# Altium PCB actuator-driver.PcbDoc
Units mm, origin at the board's own origin, x right, y up, seen from the top; angles counter-clockwise.
Board outline 50 x 50 mm, 4 copper layers (Top Layer, L2_GND, L3_SIG_PWR, Bottom Layer), stack 1.571 mm thick; 69 components, 55 nets, 249 pads, 137 vias.
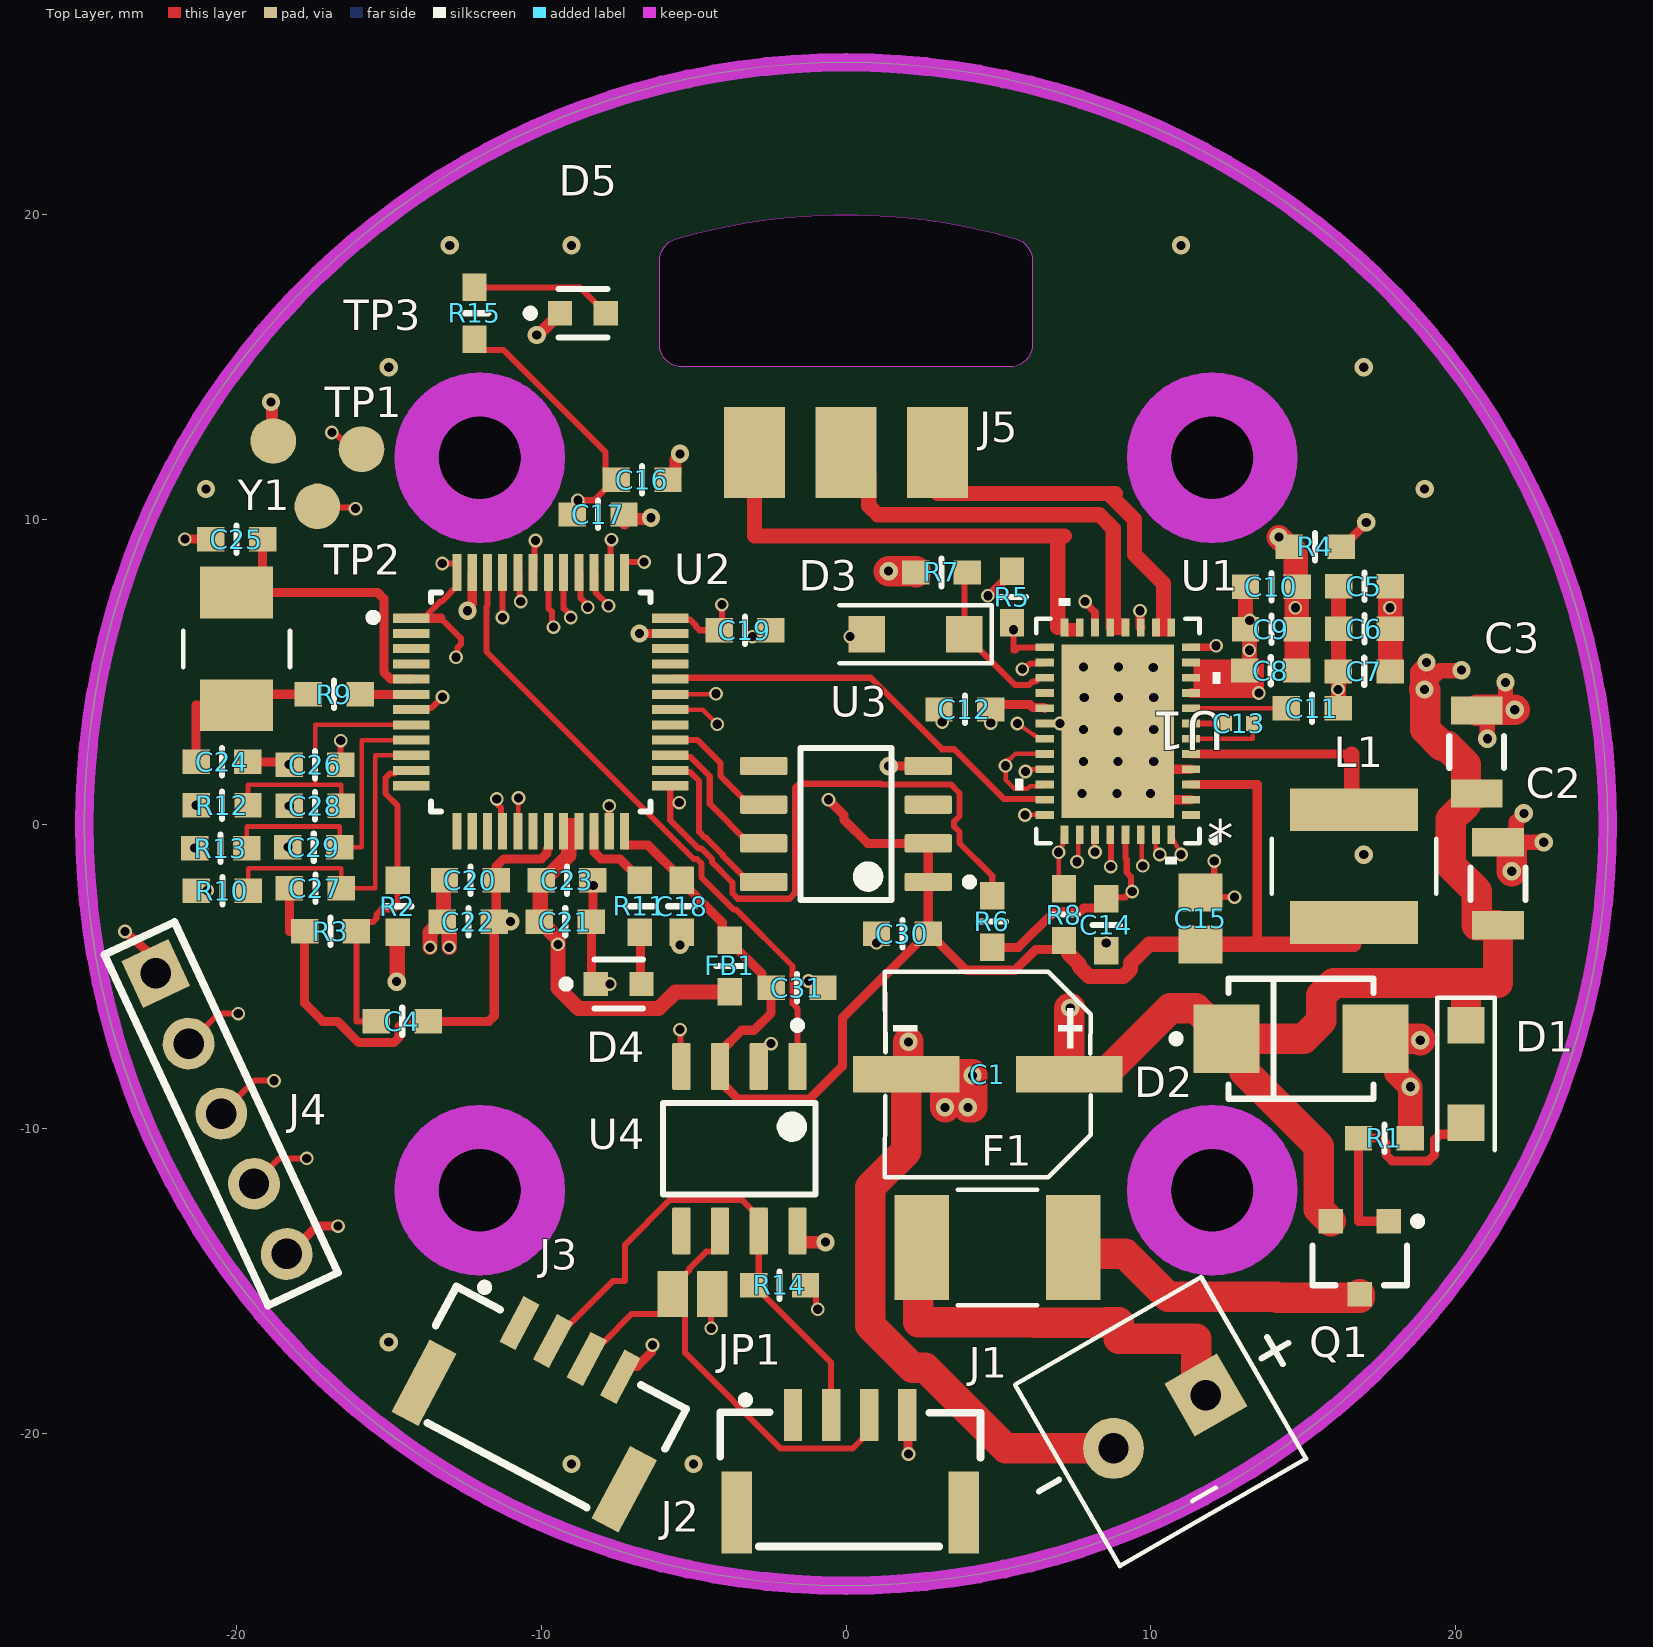
[diagram p0: Top Layer view]
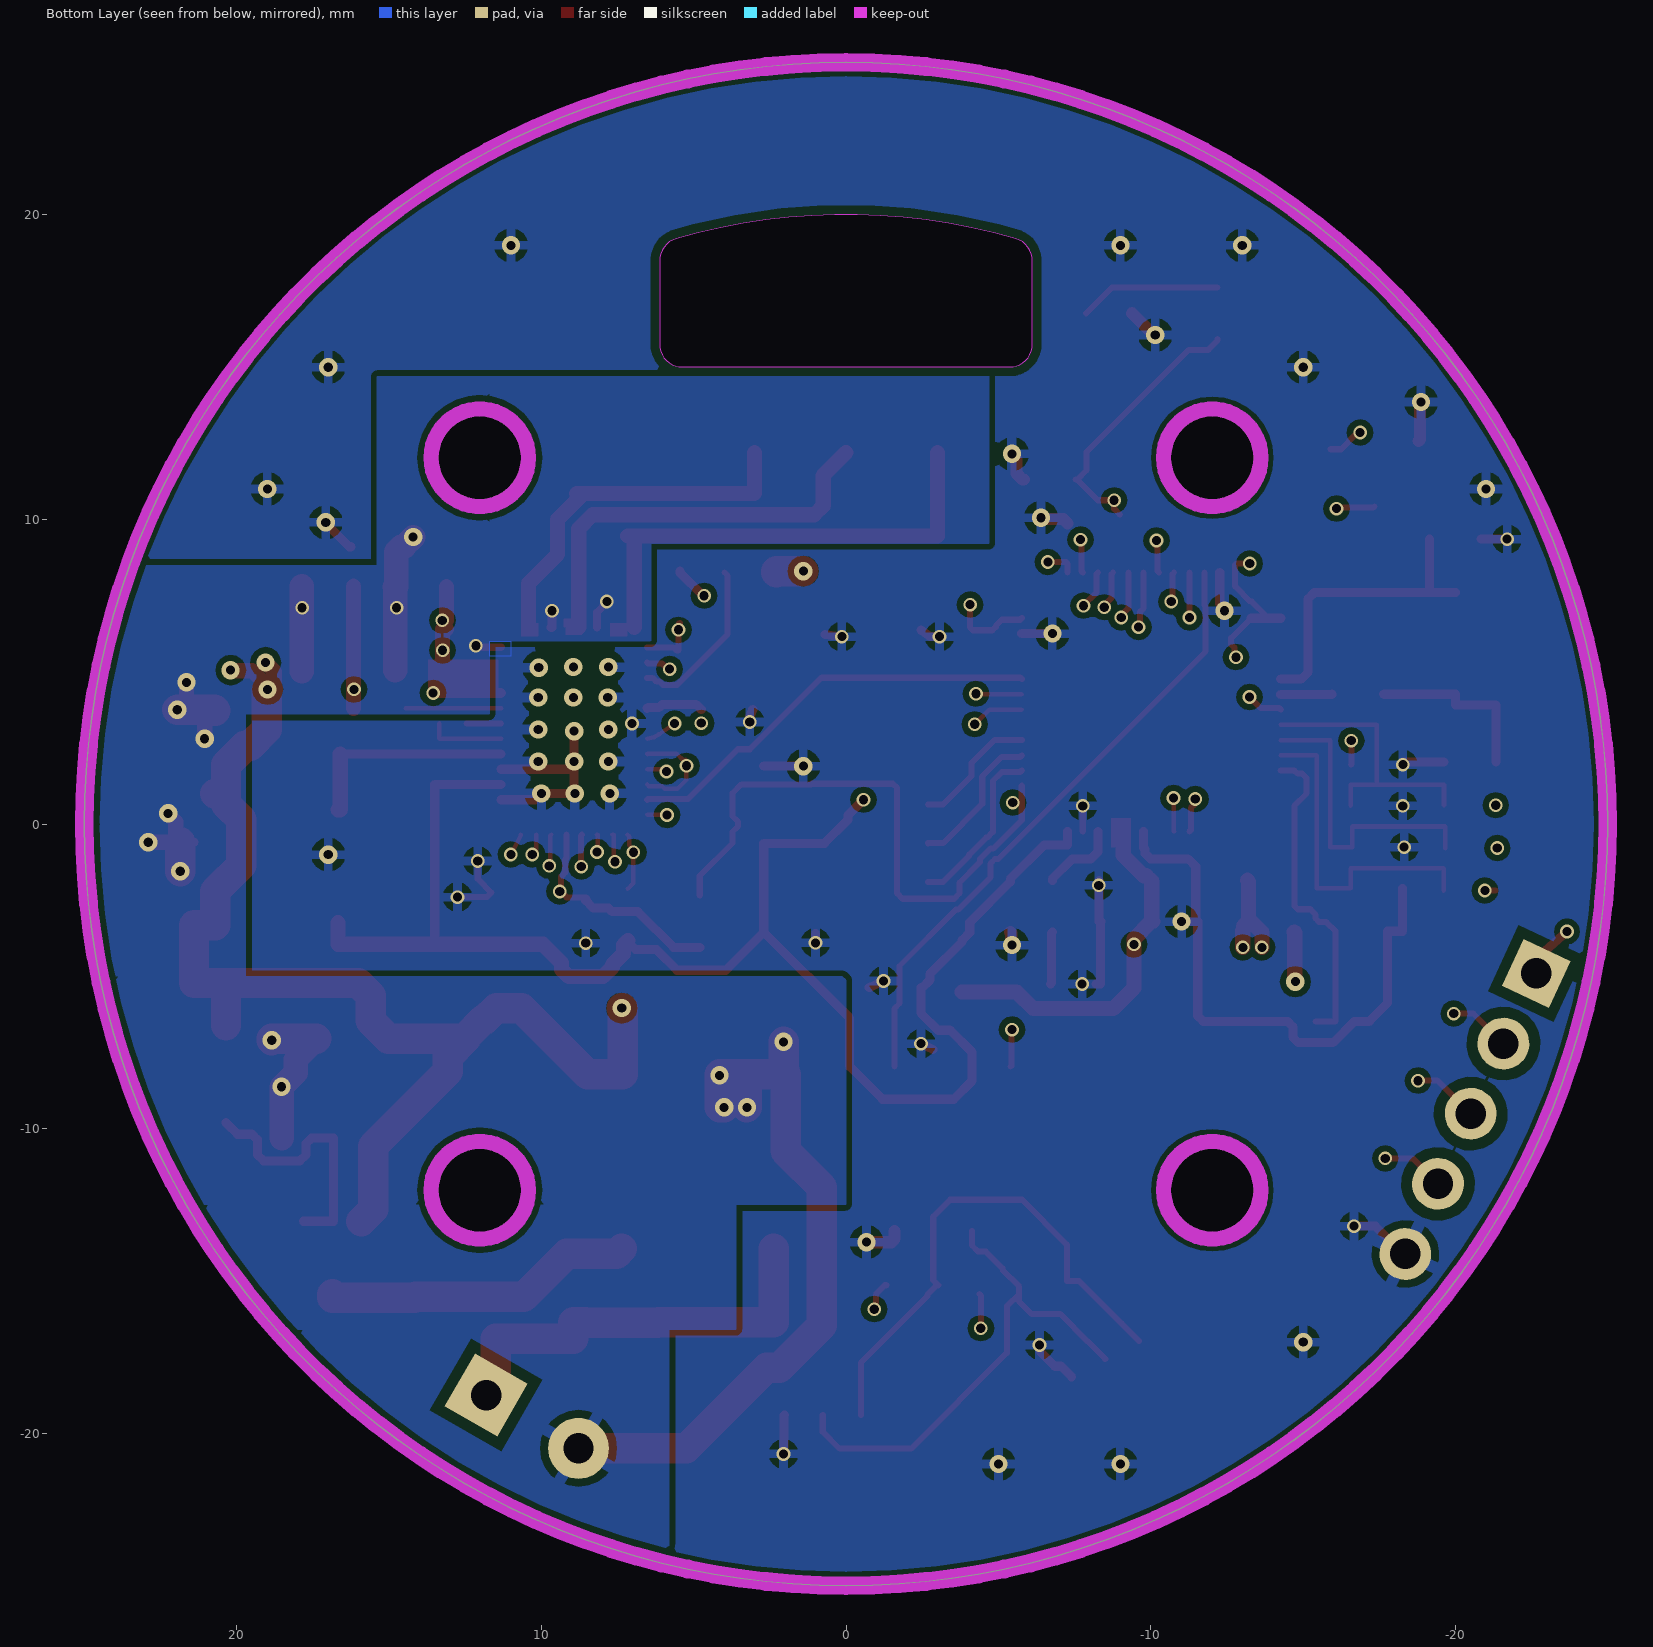
[diagram p1: Bottom Layer view, seen from below]
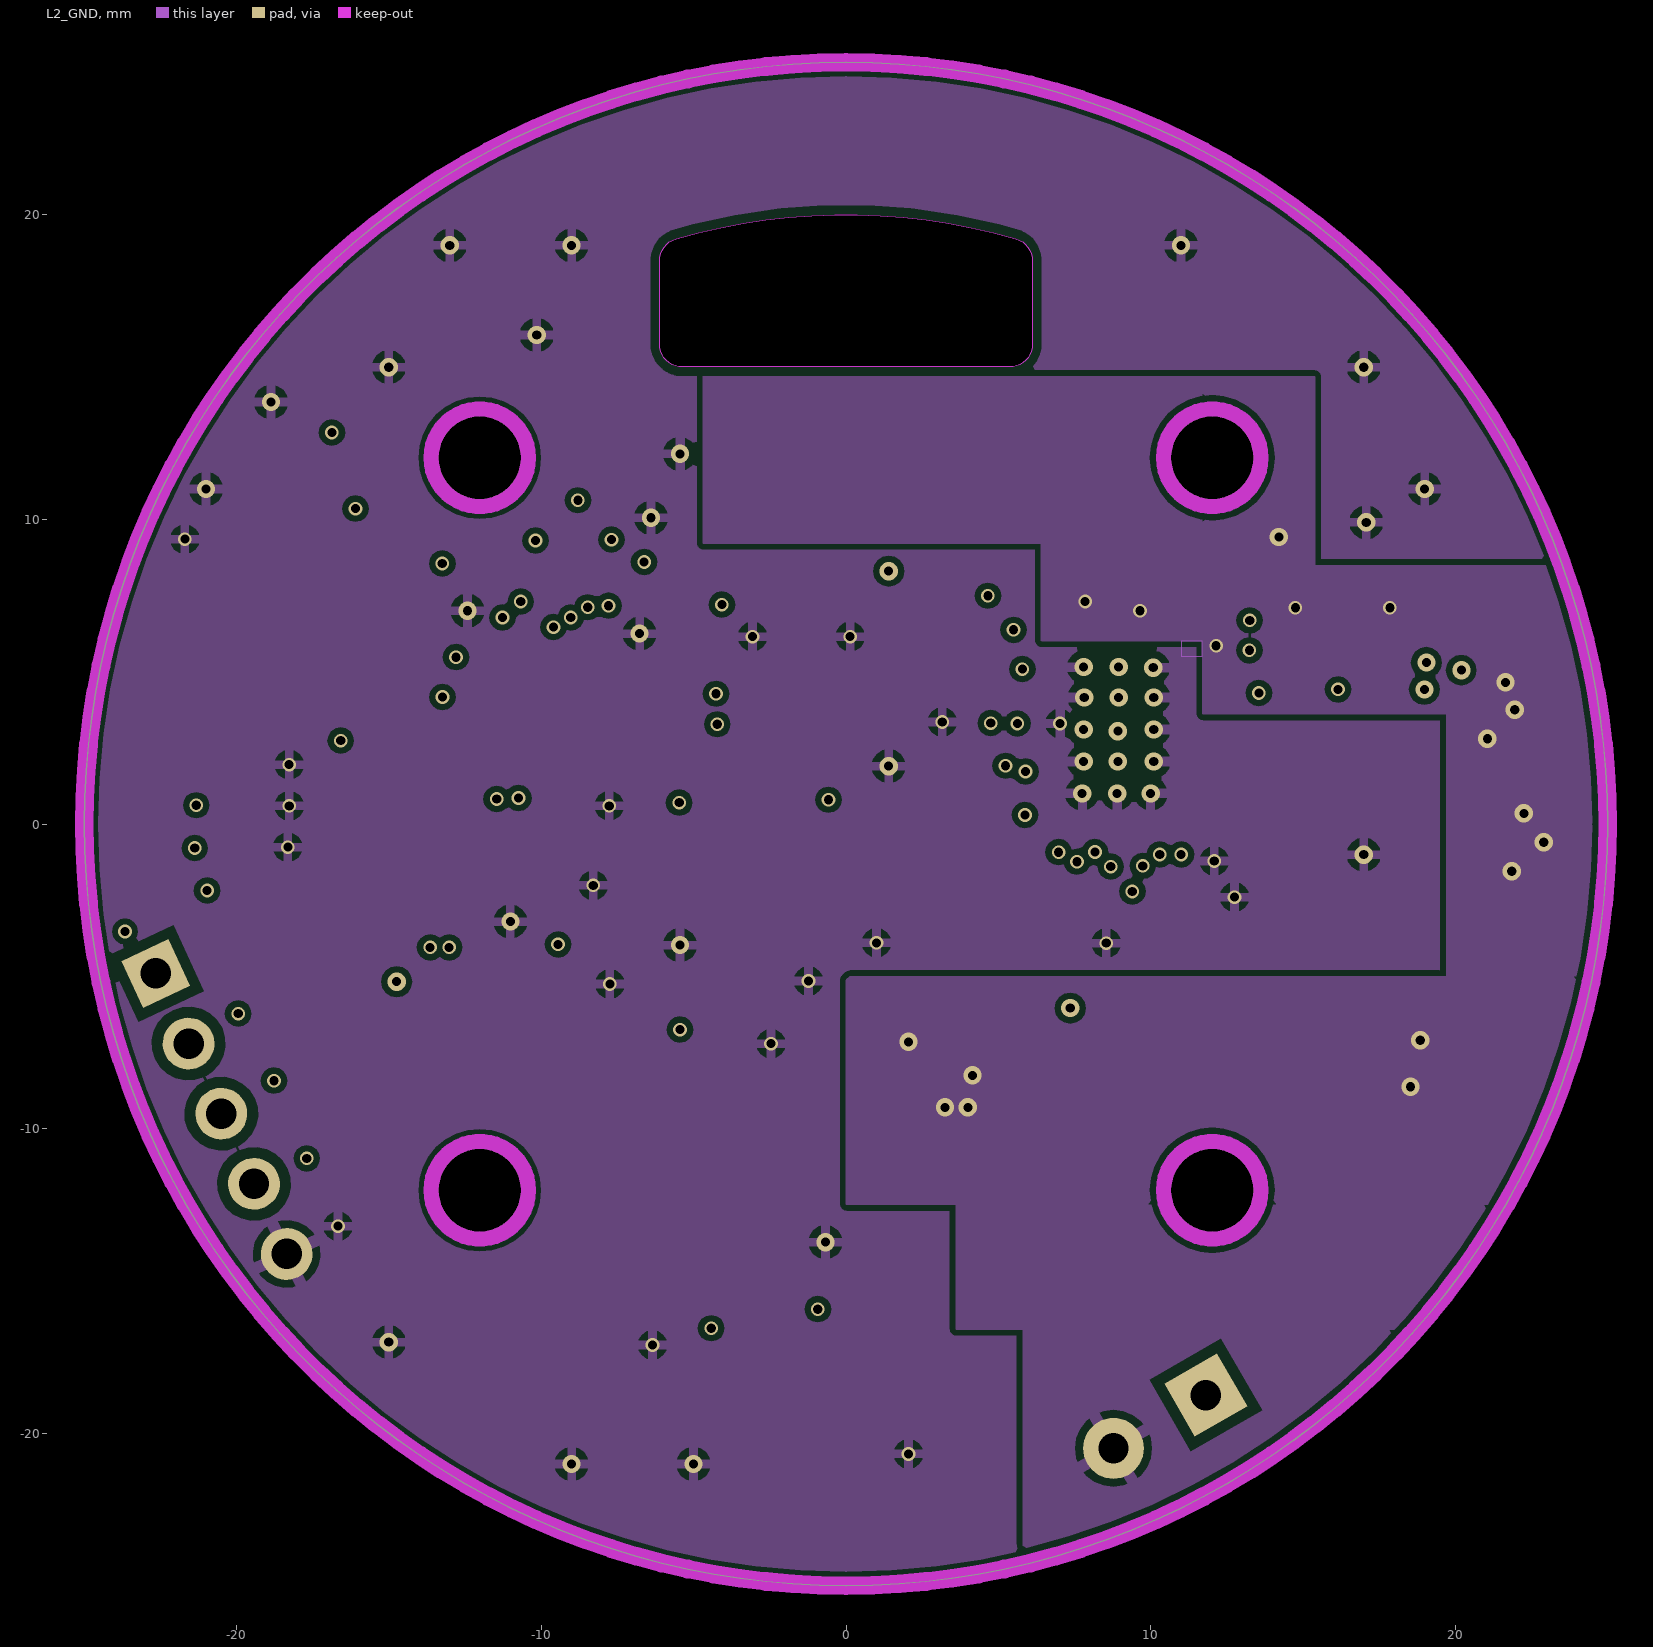
[diagram p2: L2_GND]
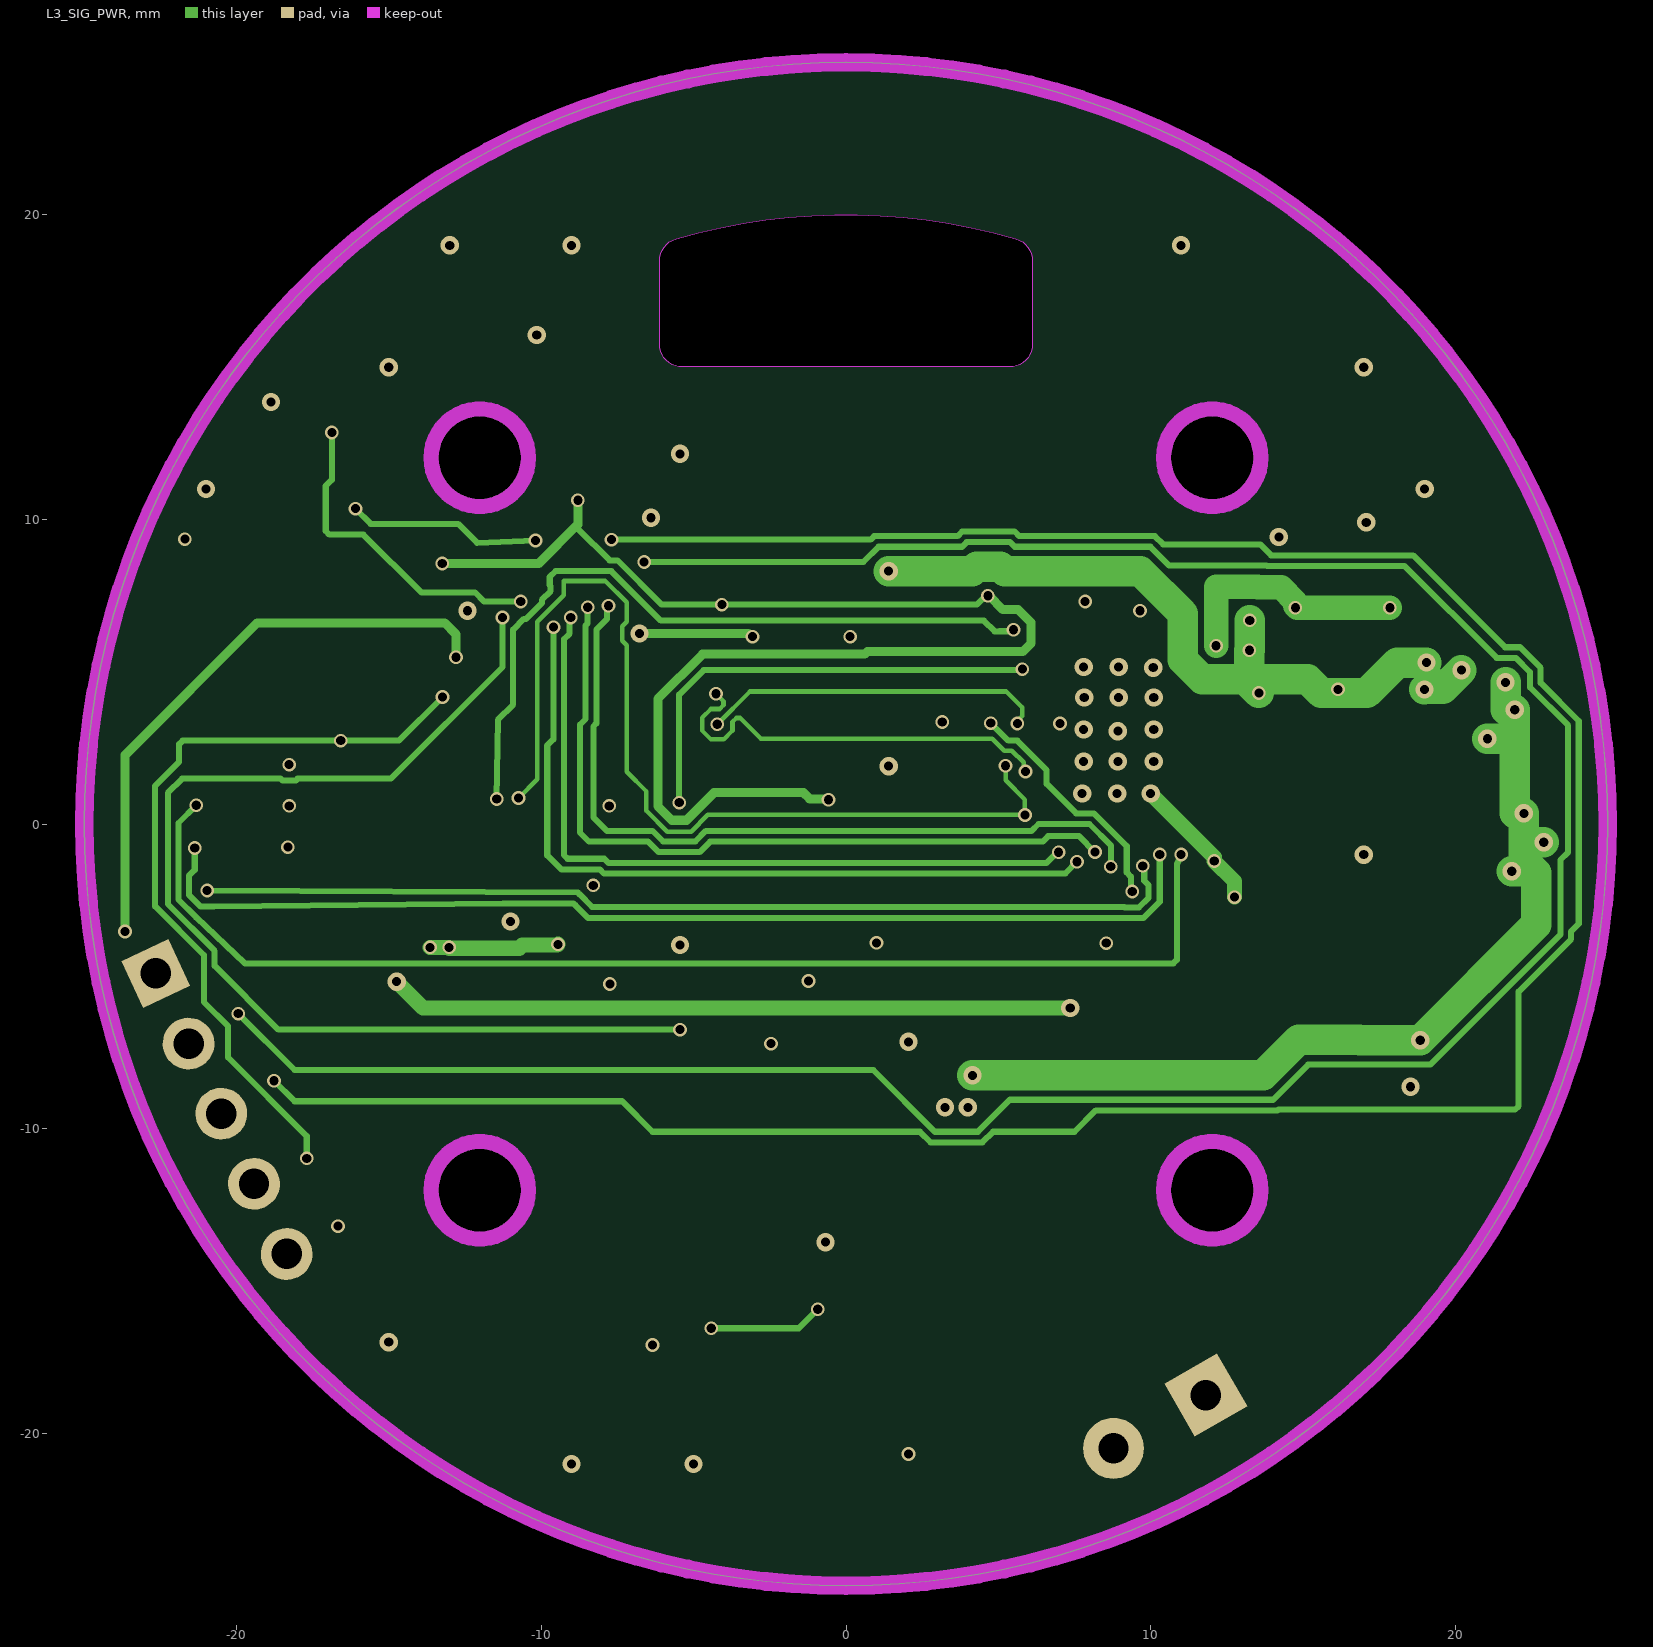
[diagram p3: L3_SIG_PWR]
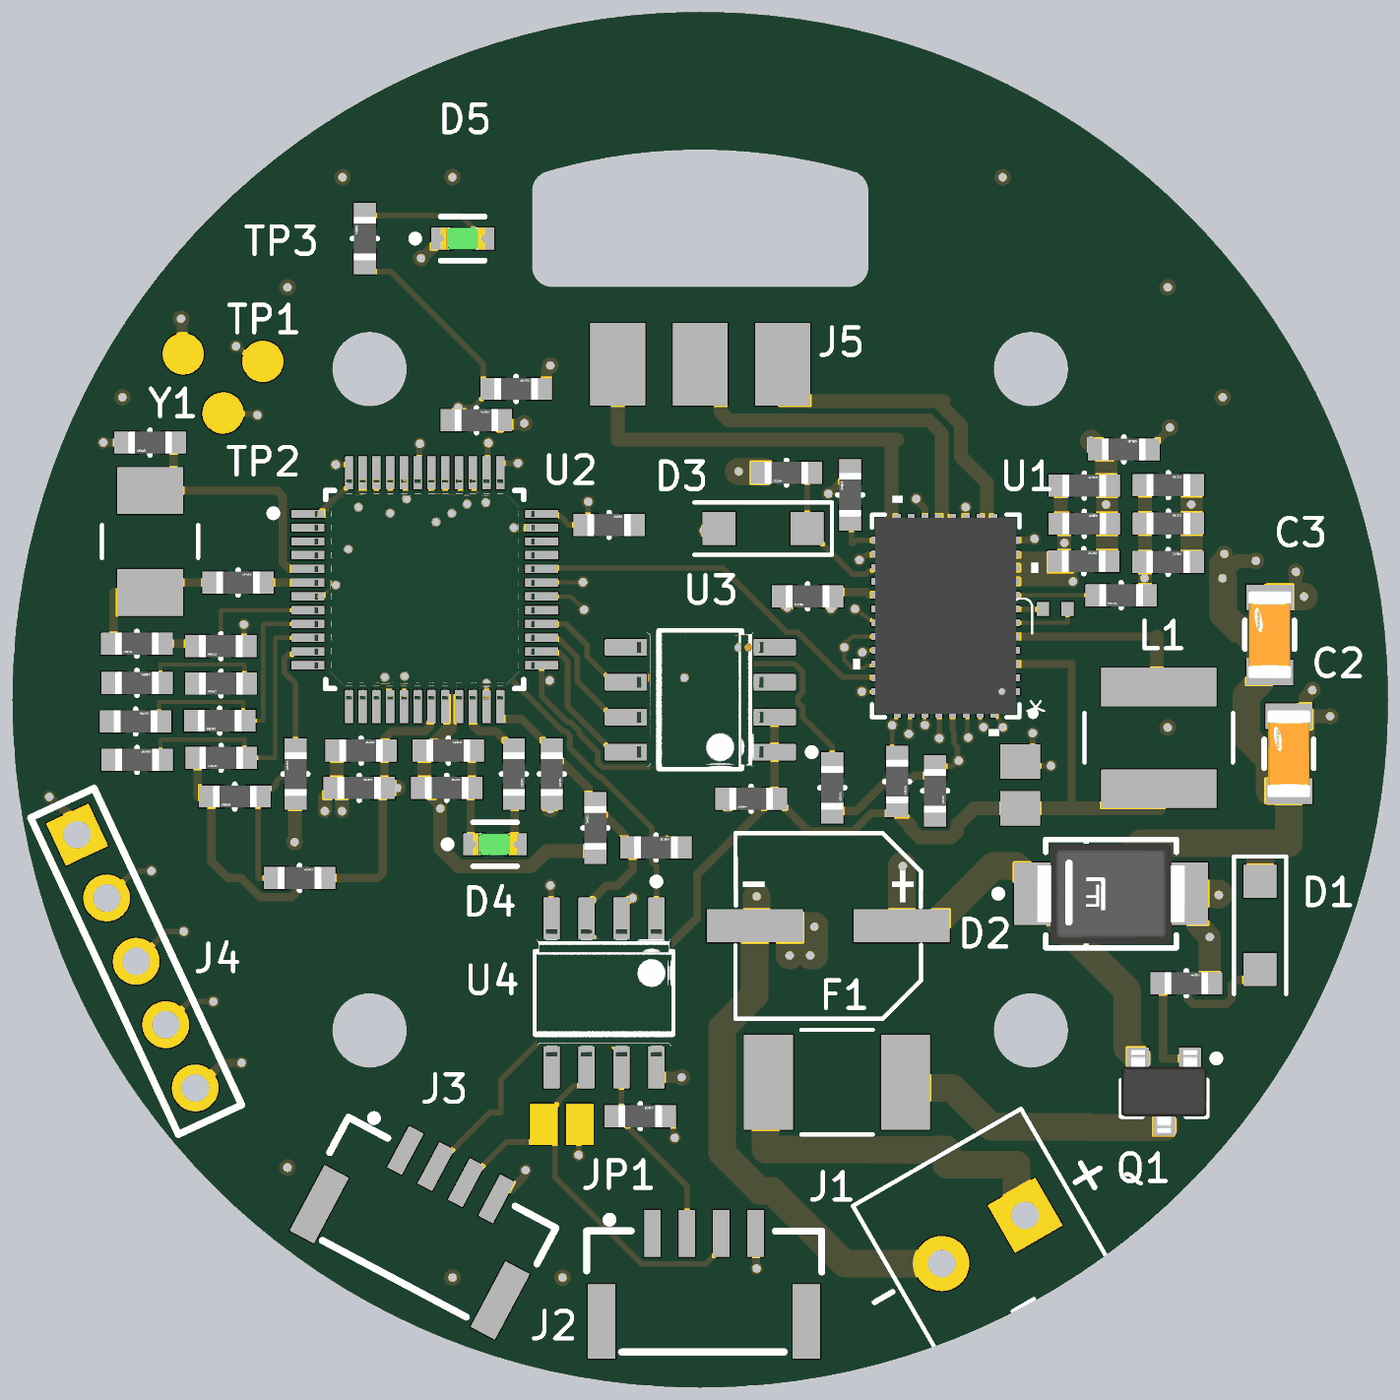
[diagram p4: 3D render of the assembled board from above, using the file's embedded part models]

## Layer stack, top to bottom
Top Solder: solder mask 0.0102, Solder Resist, Dk 3.5
Top Layer: signal copper 0.0356
Dielectric 1: prepreg 0.1, PP-006, Dk 4.1
L2_GND: signal copper 0.0175
Dielectric 2: core 1.265, FR-4, Dk 4.5
L3_SIG_PWR: signal copper 0.0175
Dielectric 3: prepreg 0.1, PP-006, Dk 4.1
Bottom Layer: signal copper 0.0356
Bottom Solder: solder mask 0.0102, Solder Resist, Dk 3.5

## Board outline
0,-25 cw(c0,0) -25,0 cw(c0,0) 0,25 cw(c0,0) 25,0 cw(c0,0)
cut-out: -6.118,15.75 -6.118,18.486 cw(c-5.368,18.486) -5.577,19.207 cw(c0,0) 5.577,19.207 cw(c5.368,18.486) 6.118,18.486 6.118,15.75 cw(c5.368,15.75) 5.368,15 -5.368,15 cw(c-5.368,15.75)

## Design rules (kind name [scope] priority, off if disabled: settings)
BoardOutlineClearance [All] p1: gap=0.3 ignorepadtopadclearanceinfootprint=FALSE
Clearance Clr_PTH [InComponent('J1') OR InComponent('J4')] p1: gap=0.35 ignorepadtopadclearanceinfootprint=TRUE
Clearance Clr_Power [InNetClass('PWR_RAIL') OR InNetClass('MOTOR_OUT') OR InNetClass('SW')] p2: gap=0.2 ignorepadtopadclearanceinfootprint=TRUE
Clearance Clr_Via [IsVia] p3: gap=0.2 ignorepadtopadclearanceinfootprint=TRUE
Clearance [All] p4: gap=0.15 ignorepadtopadclearanceinfootprint=TRUE
Height [All] p1: minheight=0 maxheight=9 prefheight=9
HoleSize [All] p1: absolutevalues=TRUE maxlimit=3 minlimit=0.3 maxpercent=80.000 minpercent=20.000
HoleToHoleClearance [All] p1: gap=0.25 allowstackedmicrovias=TRUE
MinimumAnnularRing [All] p1: minimumring=0.07
MinimumSolderMaskSliver [All] p1: minsoldermaskwidth=0.1
PolygonConnect PC_HandSolder [InComponent('J1') OR InComponent('J4')] p1: connectstyle=Relief reliefconductorwidth=0.4 reliefentries=4 polygonreliefangle="90 Angle" airgapwidth=0.25
PolygonConnect PC_Direct [InNetClass('PWR_RAIL') OR InComponent('U1')] p2: connectstyle=Direct reliefconductorwidth=0.254 reliefentries=4 polygonreliefangle="90 Angle" airgapwidth=0.254
PolygonConnect [All] p3: connectstyle=Relief reliefconductorwidth=0.3 reliefentries=4 polygonreliefangle="90 Angle" airgapwidth=0.25
RoutingVias [All] p1: holewidth=0.3 width=0.6 viastyle="Through Hole" minholewidth=0.3 minwidth=0.45 maxholewidth=0.6 maxwidth=1
SilkToSilkClearance [All] p1: silktosilkclearance=0.15
SilkToSolderMaskClearance [IsPad] p1: minsilkscreentomaskgap=0.15 clearancetoexposedcopper=FALSE
SolderMaskExpansion [All] p1: expansion=0.05 istentingtop=TRUE
SupplyNets "Schematic Supply Nets_4" [InNet('3V3')] p1: voltage=0.000
SupplyNets "Schematic Supply Nets_3" [InNet('PGND')] p2: voltage=0.000
SupplyNets "Schematic Supply Nets_2" [InNet('VM')] p3: voltage=0.000
SupplyNets "Schematic Supply Nets_1" [InNet('AVDD')] p4: voltage=0.000
SupplyNets "Schematic Supply Nets" [InNet('GND')] p5: voltage=0.000
Width W_LogicPwr [InNetClass('LOGIC_PWR')] p1: maxlimit=1 minlimit=0.15 preferedwidth=0.3
Width W_SW [InNetClass('SW')] p2: maxlimit=1 minlimit=0.25 preferedwidth=0.5
Width W_Motor [InNetClass('MOTOR_OUT')] p3: maxlimit=3 minlimit=0.25 preferedwidth=0.8
Width W_Power [InNetClass('PWR_RAIL')] p4: maxlimit=3 minlimit=0.25 preferedwidth=2 toplayer_prefwidth=1 bottomlayer_prefwidth=1 minimp=50.000000 maximp=50.000000 favimp=50.000000
Width [All] p5: maxlimit=3 minlimit=0.127 preferedwidth=0.2
24 further rules are at their usual default settings.

## Classes and differential pairs
net class LOGIC_PWR: 3V3 AVDD VDDA
net class SW: NetL1_2
net class MOTOR_OUT: OUTA OUTB OUTC
net class PWR_RAIL: PGND VIN_F VIN_RAW VM
component class actuator-driver: C1 C2 C3 C4 D1 D2 F1 J1 Q1 R1 R2 R3
component class 6_connectors: D5 J2 J3 J4 J5 R15 TP1 TP2 TP3
component class 5_can: C31 JP1 R14
component class 4_encoder: C30 U3
component class 3_mcu: C16 C17 C18 C19 C20 C21 C22 C23 C24 C25 C26 C27 C28 C29 D4 FB1 R9 R10 R11 R12 R13 U2 Y1
component class 2_drv8316: C5 C6 C7 C8 C9 C10 C11 C12 C13 C14 C15 D3 L1 R4 R5 R6 R7 R8 U1

## Components (designator, comment, footprint, x,y, rotation, side; value= is the part's Value field where it differs from the comment)
C1 "RVT47UF50V67RV0029" CAP_ELEC_6.3x7.7 4.653,-8.221 r180 top value=47uF
C2 "10u 50V" CAP_1206 21.4,-1.962 r90 top
C3 "10u 50V" CAP_1206 20.7,2.361 r90 top
C4 "100n" RES_0603 -14.566,-6.477 r0 top
C5 "100n" RES_0603 17.017,7.801 r0 top
C6 "100n" RES_0603 17.017,6.404 r0 top
C7 "100n" RES_0603 17.011,5.006 r0 top
C8 "100n" RES_0603 13.942,5.038 r0 top
C9 "100n" RES_0603 13.963,6.395 r0 top
C10 "100n" RES_0603 13.963,7.784 r0 top
C11 "1u 16V" RES_0603 15.3,3.8 r180 top
C12 "1u 16V X7R" RES_0603 3.903,3.76 r180 top
C13 "47n 50V" CAP_0402 12.9,3.3 r0 top
C14 "100n" RES_0603 8.541,-3.309 r270 top
C15 "22u 25V" CAP_0805 11.638,-3.1 r90 top
C16 "4.7u 10V" RES_0603 -6.692,11.303 r0 top
C17 "100n" RES_0603 -8.136,10.159 r0 top
C18 "100n" RES_0603 -5.394,-2.699 r270 top
C19 "100n" RES_0603 -3.315,6.359 r0 top
C20 "1u" RES_0603 -12.328,-1.849 r0 top
C21 "10n" RES_0603 -9.215,-3.203 r0 top
C22 "1u" RES_0603 -12.397,-3.203 r0 top
C23 "100n" RES_0603 -9.156,-1.849 r0 top
C24 "20p" RES_0603 -20.481,2.037 r180 top
C25 "20p" RES_0603 -20,9.35 r180 top
C26 "100n" RES_0603 -17.427,1.949 r180 top
C27 "220p C0G" RES_0603 -17.417,-2.113 r180 top
C28 "220p C0G" RES_0603 -17.423,0.595 r180 top
C29 "220p C0G" RES_0603 -17.471,-0.759 r180 top
C30 "100n" RES_0603 1.85,-3.6 r180 top
C31 "100n" RES_0603 -1.606,-5.371 r0 top
D1 "BZT52C10" SOD-123_MDD 20.35,-8.2 r270 top
D2 "SMBJ18A" FP-SMBJ-MFG 14.934,-7.049 r0 top
D3 "BZT52C3V3" SOD-123_MDD 2.286,6.223 r180 top
D4 "Green" LED_0603 -7.461,-5.253 r0 top
D5 "Green" LED_0603 -8.636,16.764 r0 top
F1 "SMD1812P150TF/24" PTC_1812_RUILON 4.973,-13.902 r0 top
FB1 "600R@100MHz" RES_0603 -3.81,-4.66 r90 top
J1 "KF350-3.5-2P" TERM_KF350_2P 10.295,-19.618 r210 top
J2 "SM04B-GHS-TB" JST_GH_SM04B 0.138,-21.001 r0 top
J3 "SM04B-GHS-TB" JST_GH_SM04B -9.812,-18.676 r332 top
J4 "SWD" HDR_1x5_2.54 -20.504,-9.509 r25 top
J5 "MOTOR" MOTOR_PADS_3 0,12.192 r180 top
JP1 "SJ" SJ_2P -5.033,-15.429 r0 top
L1 "SMNR5040-470MT" SMNR5040 16.671,-1.384 r180 top
Q1 "AO3401A" AO-SOT-23-3L_V 16.862,-14.24 r270 top
R1 "10k" RES_0603 17.671,-10.309 r0 top
R2 "100k" RES_0603 -14.715,-2.699 r90 top
R3 "10k" RES_0603 -16.919,-3.519 r180 top
R4 "0R" RES_0603 15.4,9.1 r0 top
R5 "10k" RES_0603 5.45,7.45 r90 top
R6 "5.1k" RES_0603 4.8,-3.2 r270 top
R7 "10k" RES_0603 3.136,8.255 r180 top
R8 "10k" RES_0603 7.157,-2.975 r270 top
R9 "0R" RES_0603 -16.8,4.26 r0 top
R10 "330R" RES_0603 -20.471,-2.187 r0 top
R11 "1k" RES_0603 -6.775,-2.699 r270 top
R12 "330R" RES_0603 -20.477,0.615 r0 top
R13 "330R" RES_0603 -20.525,-0.79 r0 top
R14 "120R" RES_0603 -2.179,-15.138 r0 top
R15 "1k" RES_0603 -12.192,16.764 r90 top
TP1 "TP" TP_1.5 -15.9,12.3 r0 top
TP2 "TP" TP_1.5 -17.35,10.425 r90 top
TP3 "TP" TP_1.5 -18.796,12.573 r90 top
U1 "DRV8316CRRGFR" VQFN40_RGF_TEX 8.922,3.048 r180 top
U2 "STM32G431CBT6" FP-LQFP48-5B-MFG -10.019,4.005 r0 top
U3 "MT6701CT-STD" FP-D0008A-MFG 0,0 r180 top
U4 "SN65HVD230DR" FP-D0008A-MFG -3.5,-10.659 r270 top
Y1 "X50328MSB2GI" Crystal_5032_2P_YXC -20,5.75 r90 top

## Footprints (in the part's own frame and the unit in brackets; to place one, negate y for a bottom-side part, rotate by r counter-clockwise, add the part's x,y. Pads: shape width x height; smd on the part's side, far side on the other; paste and mask are expansions set on the pad)
AO-SOT-23-3L_V [mm] "SOT23, 3-Leads, Body 3.1x1.8mm, Pitch 0.95mm"
  rect 0.8x0.8 smd mask+0.05: 1(-1.2,0.95) 2(-1.2,-0.95) 3(1.2,0)
  silkscreen extent -1.32,-1.55 0.9,2.03, body extent -1.5,-1.55 1.5,1.55, height 1.25
CAP_0402 [mm] "Chip capacitor 0402 (1005), lands 0.45 x 0.50 mm, gap 0.45 mm (Kyocera MLCC land guide, 1005 +/-0.05)"
  rect 0.45x0.5 smd mask+0.05: 1(-0.45,0) 2(0.45,0)
CAP_0805 [mm] "Chip Capacitor, 2-Leads, Body 2.00x1.25mm, IPC Medium Density"
  rect 1.25x1.45 smd mask+0.05: 1(-0.85,0) 2(0.85,0)
  body extent -1.08,-0.7 1.07,0.7, height 1.4
CAP_1206 [mm]
  rect 0.925x1.7 smd paste+0 mask+0.05: 1(-1.362,0) 2(1.362,0)
  silkscreen extent -0.53,-0.9 0.53,0.9, body extent -1.92,-1 1.92,1, height 0.25
CAP_ELEC_6.3x7.7 [mm]
  rect 3.5x1.2 smd mask+0.05: 1(-2.67,0) 2(2.67,0)
  silkscreen extent -3.38,-3.38 3.38,3.38, body extent -3.3,-3.3 3.3,3.3, height 7.7
Crystal_5032_2P_YXC [mm]
  rect 1.7x2.4 smd mask+0.05: 1(-1.85,0) 2(1.85,0)
  silkscreen extent -0.6,-1.75 0.6,1.75, body extent -2.5,-1.6 2.5,1.6, height 1.2
FP-D0008A-MFG [mm]
  rrect17% 1.55x0.6 smd paste+0 mask+0.05: 1(-2.7,1.905) 2(-2.7,0.635) 3(-2.7,-0.635) 4(-2.7,-1.905) 5(2.7,-1.905) 6(2.7,-0.635) 7(2.7,0.635) 8(2.7,1.905)
  silkscreen extent -4.18,-2.5 1.5,2.5, body extent -3.57,-2.75 3.57,2.75, height 0.25
FP-LQFP48-5B-MFG [mm]
  rect 1.2x0.3 smd paste+0 mask+0.05: 1(-4.25,2.75) 2(-4.25,2.25) 3(-4.25,1.75) 4(-4.25,1.25) 5(-4.25,0.75) 6(-4.25,0.25) 7(-4.25,-0.25) 8(-4.25,-0.75) 9(-4.25,-1.25) 10(-4.25,-1.75) 11(-4.25,-2.25) 12(-4.25,-2.75) 25(4.25,-2.75) 26(4.25,-2.25) 27(4.25,-1.75) 28(4.25,-1.25) 29(4.25,-0.75) 30(4.25,-0.25) 31(4.25,0.25) 32(4.25,0.75) 33(4.25,1.25) 34(4.25,1.75) 35(4.25,2.25) 36(4.25,2.75)
  rect 0.3x1.2 smd paste+0 mask+0.05: 13(-2.75,-4.25) 14(-2.25,-4.25) 15(-1.75,-4.25) 16(-1.25,-4.25) 17(-0.75,-4.25) 18(-0.25,-4.25) 19(0.25,-4.25) 20(0.75,-4.25) 21(1.25,-4.25) 22(1.75,-4.25) 23(2.25,-4.25) 24(2.75,-4.25) 37(2.75,4.25) 38(2.25,4.25) 39(1.75,4.25) 40(1.25,4.25) 41(0.75,4.25) 42(0.25,4.25) 43(-0.25,4.25) 44(-0.75,4.25) 45(-1.25,4.25) 46(-1.75,4.25) 47(-2.25,4.25) 48(-2.75,4.25)
  silkscreen extent -5.62,-3.6 3.6,3.6, body extent -4.95,-4.95 4.95,4.95, height 0.25
FP-SMBJ-MFG [mm]
  rect 2.16x2.26 smd paste+0 mask+0.05: 1(-2.45,0) 2(2.45,0)
  silkscreen extent -4.22,-1.97 2.37,1.97, body extent -3.63,-2.07 3.63,2.07, height 0.25
HDR_1x5_2.54 [mm]
  rect 1.7x1.7 hole 1 mask+0.05: 1(0,5.08)
  round 1.7 hole 1 mask+0.05: 2(0,2.54) 3(0,0) 4(0,-2.54) 5(0,-5.08)
  silkscreen extent -1.27,-6.35 1.27,6.35, body extent -1.27,-6.35 1.27,6.35, height 8.5
JST_GH_SM04B [mm]
  rect 0.6x1.7 smd mask+0.05: 1(-1.876,1.6) 2(-0.626,1.6) 3(0.625,1.6) 4(1.875,1.6)
  rect 1x2.7 smd mask+0.05: 5(3.725,-1.6) 6(-3.725,-1.6)
  silkscreen extent -4.27,-2.71 4.28,2.22, body extent -4.13,-3 4.13,3, height 4.25
LED_0603 [mm]
  rect 0.8x0.8 smd paste+0 mask+0.05: 1(-0.75,0) 2(0.75,0)
  silkscreen extent -1.85,-0.8 0.8,0.8, body extent -1.25,-0.55 1.25,0.55, height 0.25
MOTOR_PADS_3 [mm]
  rect 2x3 smd mask+0.05: 1(-3,0) 2(0,0) 3(3,0)
PTC_1812_RUILON [mm]
  rect 1.78x3.45 smd mask+0.05: 1(-2.49,0) 2(2.49,0)
  silkscreen extent -1.3,-1.9 1.3,1.9, body extent -2.25,-1.6 2.25,1.6, height 1.5
RES_0603 [mm]
  rect 0.9x0.8 smd paste+0 mask+0.05: 1(-0.85,0) 2(0.85,0)
  silkscreen extent 0,-0.45 0,0.45, body extent -1.4,-0.55 1.4,0.55, height 0.25
SJ_2P [mm]
  rect 1x1.5 smd paste-2539.97 mask+0.05: 1(0.65,0) 2(-0.65,0)
SMNR5040 [mm]
  rect 4.2x1.4 smd mask+0.05: 1(0,1.85) 2(0,-1.85)
  silkscreen extent -2.7,-0.9 2.7,0.9, body extent -2.5,-2.5 2.5,2.5, height 4
SOD-123_MDD [mm]
  rect 1.2x1.2 smd mask+0.05: 1(1.6,0) 2(-1.6,0)
  silkscreen extent -2.5,-0.95 2.5,0.95, body extent -1.35,-0.8 1.35,0.8, height 1.1
TERM_KF350_2P [mm]
  rect 2x2 hole 1 mask+0.05: 1(-1.75,0)
  round 2 hole 1 mask+0.05: 2(1.75,0)
  silkscreen extent -4.95,-3.43 4.57,3.45, body extent -3.5,-3.45 3.5,3.45, height 8.8
TP_1.5 [mm]
  round 1.5 smd paste-2539.97 mask+0.05: 1(0,0)
VQFN40_RGF_TEX [mm]
  rect 0.6x0.254 smd paste+0 mask+0.05: 1(-2.4,2.751) 2(-2.4,2.251) 3(-2.4,1.75) 4(-2.4,1.25) 5(-2.4,0.75) 6(-2.4,0.25) 7(-2.4,-0.25) 8(-2.4,-0.75) 9(-2.4,-1.25) 10(-2.4,-1.75) 11(-2.4,-2.251) 12(-2.4,-2.751) 21(2.4,-2.751) 22(2.4,-2.251) 23(2.4,-1.75) 24(2.4,-1.25) 25(2.4,-0.75) 26(2.4,-0.25) 27(2.4,0.25) 28(2.4,0.75) 29(2.4,1.25) 30(2.4,1.75) 31(2.4,2.251) 32(2.4,2.751)
  rect 0.254x0.6 smd paste+0 mask+0.05: 13(-1.75,-3.4) 14(-1.25,-3.4) 15(-0.75,-3.4) 16(-0.25,-3.4) 17(0.25,-3.4) 18(0.75,-3.4) 19(1.25,-3.4) 20(1.75,-3.4) 33(1.75,3.4) 34(1.25,3.4) 35(0.75,3.4) 36(0.25,3.4) 37(-0.25,3.4) 38(-0.75,3.4) 39(-1.25,3.4) 40(-1.75,3.4)
  rect 3.7x5.7 smd paste-1.905 mask+0.05: 41(0,0)
  silkscreen extent -3.37,-4.37 3.37,4.37, body extent -2.55,-3.56 2.55,3.56, height 0.99

## Part data
C1: "47 uF 50 V aluminium electrolytic, 6.3x7.7", Equivalent Series Resistance(ESR)=-, JLCPCB Part Class="Extended Part", LCSC Part Name="47uF ±20% 50V", Manufacturer=KNSCHA(科尼盛), Operating Temperature=-55℃~+105℃, Ripple Current=70mA@120Hz, Tolerance=±20%, Voltage Rating=50V, AddInBom=yes, ConvertToPcb=yes, Datasheet=https://item.szlcsc.com/datasheet/RVT47UF50V67RV0029/3103843.html, Diameter=6.3mm, FootprintName=CAP-SMD_BD6.3-L6.6-W6.6-LS7.6-FD, Height - Seated (Max)=7.7mm, Lifetime=2000hrs@105℃, ManufacturerPart=RVT47UF50V67RV0029, ModelId=d5dd8793587942c3ae18823ce868290a, ModelName=CAP-SMD_BD6.3-L6.6-W6.6-H7.7, ModelTransform=275.59,259.842,0,0,0,0,0,0,0, Polarity type=Polarized, Supplier=LCSC, Supplier Footprint=SMD,D6.3xL7.7mm, SupplierPart=C2887275, Symbol=RVT47UF50V67RV0029
C2 C3: library part CAP_1206, "Capacitor, 1206"
C4 C5 C6 C7 C8 C9 C10 C11 C12 C14 C16 C17 C18 C19 C20 C21 C22 C23 C24 C25 C26 C27 C28 C29 C30 C31: library part CAP_0603, "Capacitor, 0603"
C13: library part CAP_0402, "Capacitor, 0402", LCSC=C307339, Manufacturer="Samsung Electro-Mechanics", MPN=CL05B473KB5VPNC
C15: library part CAP_0805, "Capacitor, 0805"
D1: "Surface Mount Zener Diode, 10 V, SOD-123", LCSC=C2103, Manufacturer="Changjing (CJ)"
D2: "TVS DIODE 18V 29.2V DO214AA", Breakdown Voltage=20V, Clamping Voltage=29.2V, LCSC=C10212, Manufacturer=RUILON, Max Junction Temp=+150°C, Package=SMBJ, Peak Pulse Current=20.6A, Peak Pulse Power=600W, Reverse Standoff Voltage=18V, Temperature="-65°C to +150°C", Temperature Range Low=-65°C, Automotive=No, Category=Diode, ComponentLink2Description=Datasheet, ComponentLink2URL=https://www.littelfuse.com/~/media/electronics/datasheets/tvs_diodes/littelfuse_tvs_diode_smbj_datasheet.pdf.pdf, Device Class L1="Circuit Protection", Device Class L2="TVS Diodes", Device Class L3=unset, Digikey Description="TVS DIODE 18V 29.2V DO214AA", Direction=Unidirectional, Height=2.61mm, Lead Free=Yes, Manufacturer Part Number=SMBJ18A, Mouser Description="TVS Diodes - Transient Voltage Suppressors 18Vr 600W 20.6A 5% UniDirectional", Number Of Channels=1, Octopart=https://octopart.com/smbj18a-littelfuse-35303, RoHS=TRUE, Temperature Range High=+150°C
D3: "Surface Mount Zener Diode, 3.3 V, SOD-123", LCSC=C173413, Manufacturer="MDD (Microdiode)"
D4 D5: library part LED_0603, "LED, 0603", Case Code (Imperial)=0603, Case Code (Metric)=1608, Forward Current=20mA, Forward Voltage=2V, Lens Color="Clear, Colorless", Max Operating Temperature=85°C, Min Operating Temperature=-55°C, Power Dissipation=75mW, Reverse Voltage=5V, Case/Package=0603, Color=Green, Depth=800µm, Dominant Wavelength=571nm, Height=550µm, Illumination Color=Green, Lead Free="Lead Free", Length=1.6mm, Lens Style=Clear, Lens Transparency=Clear, Luminous Intensity=35mcd, Mount="Surface Mount", NexarPartId=549907, Number of Elements=1, Number of LEDs=1, Number of Pins=2, Packaging="Tape and Reel", Power Rating=75mW, Radiation Hardening=No, RoHS=Compliant, Schedule B="8541402000, 8541402000|8541402000|8541402000|8541402000|8541402000", Test Current=20mA, Viewing Angle=130°, Wavelength=574nm, Width=800µm
F1: "PTC resettable fuse, 24 V, 1.5 A hold, 1812"
FB1: library part FB_0603, "Ferrite bead, 0603"
J1: "Screw terminal 2P 3.5 mm, power in"
J2 J3: "JST GH 4-pin side entry, CAN", Color=White, Current Rating=1A, Flame Retardant Rating=UL94V-0, JLCPCB Part Class="Extended Part", LCSC Part Name="1x4P 间距:1.25mm 卧贴 系列:GH", Manufacturer=JST, ManufacturerPart=SM04B-GHS-TB(LF)(SN), Operating Temperature=-25℃~+85℃, Voltage Rating=50V, AddInBom=yes, Contact Material="Phosphor bronze", Contact Plating=Tin, ConvertToPcb=yes, Datasheet=https://item.szlcsc.com/datasheet/SM04B-GHS-TB(LF)(SN)/207060.html, FootprintName=CONN-SMD_4P-P1.25_SM04B-GHS-TB-LF-SN, ModelId=b0352f6928cf4bf099b202a6090d3c8d, ModelName=CONN-SMD_GH1.25-WS-4P, ModelTransform=324.8025,191.3382,0,0,0,0,0,-6.024,0, Mounting Type="Surface Mount, Right Angle", Number of Pins=4P, Number of PINs Per Row=4, Number of Rows=1, Pins Structure=1x4P, Pitch=1.25mm, Plastic Material=PA9T, Reference Series=GH, Row Spacing=-, Supplementary Features="Auxiliary Solder Pin", Supplier=LCSC, Supplier Footprint=SMD,P=1.25mm,卧贴, SupplierPart=C189895, Symbol=SM04B-GHS-TB(LF)(SN), X-Length of Bottom Edge on Board (Spacing Line)=8.25mm, Y-Width of Bottom Edge on Board=4.13mm, Z-Height of the Board=4.25mm
J4: "SWD header 1x5 2.54 mm"
J5: library part MOTOR_PADS_3, "Motor phase solder pads"
JP1: library part SJ_2P, "Solder jumper, 2-pad, open"
L1: "47 uH shielded power inductor, 5x5x4 mm"
Q1: "P-Channel MOSFET, 30 V, 4 A, -55 to 150 degC, 3-Pin SOT-23-3L, RoHS, Tape and Reel", Continuous Drain Current=4A, Drain-Source On-Volt=30V, Frequency (Max)=NotRequiredMHz, Gate-Source Voltage (Max)=?12V, Manufacturer="Alpha and Omega", Operating Temp Range=-55Cto150C, Operating Temperature Classification=Military, Output Power (Max)=NotRequiredW, Package Description="3-Pin Small Outline Transistor, Body 2.95 x 1.6 mm, Pitch 0.95 mm", Package Reference=SOT-23-3L, Package Type=SOT-23, Power Dissipation=1.4W, Power Gain=NotRequireddB, Channel Mode=Enhancement, Datasheet URL=http://www.aosmd.com/res/data_sheets/AO3401A.pdf, Datasheet Version="Rev. 3, 03/2011", Drain Current (Max)=4A, Drain Efficiency=NotRequired%, Drain-Source On-Res=0.044ohm, Manufacturer URL=http://www.aosmd.com/, Mounting=SurfaceMount, Mounting Technology=SurfaceMount, Noise Figure=NotRequireddB, Number of  Elements=1, Package URL=http://www.aosmd.com/res/packaging_information/SOT-23-3L.pdf, Pin Count=3, Polarity=P, Rad Hardened=No, Type=PowerMOSFET
R1 R2 R3 R4 R5 R6 R7 R8 R9 R10 R11 R12 R13 R14 R15: library part RES_0603, "Resistor, 0603"
TP1 TP2 TP3: library part TP_1.5, "Test pad, 1.5 mm round"
U1: "40-V max 8-A peak 3-phase motor driver with integrated current sensing, FETs, and enhanced CSA specs 40-VQFN -40 to 125", Manufacturer_Name="Texas Instruments", Copyright="Copyright (C) 2026 Ultra Librarian. All rights reserved.", Manufacturer_Part_Number=DRV8316CRRGFR, RefDes=RefDes, Type="Power Management"
U2: "MAINSTREAM ARM CORTEX-M4+ MCU 17", Ambient Temperature Range High=+85°C, Ambient Temperature Range Low=-40°C, Frequency=170MHz, Manufacturer=STMicroelectronics, Max Junction Temp=+105°C, Max Supply Voltage=3.6V, Min Supply Voltage=1.62V, Package=LQFP48-5B, Temperature="-40°C to +85°C", Automotive=No, Category=IC, ComponentLink2Description=Datasheet, ComponentLink2URL=https://www.st.com/resource/en/datasheet/stm32g431cb.pdf, Core Architecture="Arm Cortex-M4", Data Bus Width=32bits, Device Class L1="Integrated Circuits (ICs)", Device Class L2="Embedded Processors and Controllers", Device Class L3=Microcontrollers, Digikey Description="MAINSTREAM ARM CORTEX-M4+ MCU 17", Height=1.6mm, Interface=I2C,SPI,UART,USART,CAN,USB,LIN,IrDA,I2S, Lead Free=Yes, Manufacturer Part Number=STM32G431CBT6, Memory Size=128KBytes, Memory Type=FLASH, Number Of A/D Converters=1, Number Of Adc Channels=17, Number Of Cores=1, Number Of I2C Channels=3, Number Of I/Os=38, Number Of Pwm Channels=31, Number Of Spi Channels=3, Number Of Timers/Counters=14, Number Of Uart Channels=4, Number Of Usb Channels=1, Octopart=https://octopart.com/stm32g431cbt6-stmicroelectronics-98835224, Ram Size=32KBytes, RoHS=TRUE, Standoff Height=0.05mm, Temperature Range High=+85°C, Temperature Range Low=-40°C
U3: "Magnetic angle encoder, SOP-8"
U4: "IC TRANSCEIVER HALF 1/1 8SOIC", Case/Package=D, Max Operating Temperature=85°C, Max Supply Current=17mA, Max Supply Voltage=3.6V, Min Operating Temperature=-40°C, Min Supply Voltage=3V, Operating Supply Voltage=3.3V, Package Quantity=1, Contact Plating=Gold, Data Rate=1Mbps, Lead Free="Lead Free", Nominal Supply Current=17mA, Number of Drivers=1, Number Of I/Os=2, Number of Pins=8, Number of Receive Buffers=1, Number of Receivers=1, Number of Transceivers=1, Number of Transmit Buffers=1, Packaging="Tape and Reel", Radiation Hardening=No, REACH SVHC="No SVHC", Termination=SMD/SMT, Weight=0.002561oz
Y1: "8 MHz crystal, 5032, 2-pad"

## Free pads (board coordinates)
  round 2.7 hole 2.7 unplated: MH1(12.021,12.021) MH2(-12.021,12.021) MH3(-12.021,-12.021) MH4(12.021,-12.021)

## Via types
v1: diameter 0.45, hole 0.3, Top Layer to Bottom Layer, tented both sides, 81 vias
v2: diameter 0.6, hole 0.3, Top Layer to Bottom Layer, tented both sides, 56 vias

## Nets (pads, with @x,y where several pads share a name; then routed paths per layer and width w, separated by ;. In a path a pad name is that pad's centre, name@x,y a point inside that pad or via, vN(x,y) a via of type N, cw(c..) or ccw(c..) an arc to the next point about the centre after c; other vN are vias at no path point)
3V3: C15.1 C16.1 C17.1 C18.1 C19.1 C30.1 C31.1 FB1.2 J4.1 L1.1 R5.2 R8.2 R15.1 U1.3 U2.1 U2.24 U2.36 U2.48 U3.1 U3.2 U4.3 | length 138.9
  Top Layer w0.2: J4.1 J4.1@-22.651,-4.424 ; U2.1@-13.819,6.755 -13.769,6.805 -13.769,6.849 -13.316,7.302 -13.272,7.302 -12.769,7.805 U2.48 -12.769,8.5 -12.819,8.55 v1(-13.25,8.55) ; -13.298,6.755 -12.643,6.1 -12.643,5.9 -12.752,5.79 -12.752,5.523 v1(-12.8,5.475) ; R15.1 -12.192,15.864 -11.892,15.564 -11.251,15.564 -7.892,12.205 -7.892,11.603 C16.1@-7.592,11.303 ; C17.1 -8.8,10.345 v1(-8.8,10.625) -8.27,10.625 C16.1@-7.592,11.303 ; C16.1 C16.1@-7.592,11.303 ; U2.36 -5.719,6.705 -5.116,6.705 -4.919,6.509 -4.919,6.476 -4.802,6.359 C19.1 -4.075,6.449 v1(-4.075,7.2)
  Top Layer w0.3: v1(-23.665,-3.53) J4.1@-22.651,-4.424 ; U2.1 -13.819,6.755 -13.298,6.755 ; U2.24 -7.269,-0.695 -6.498,-0.695 -5.394,-1.799 C18.1 -5.394,-1.899 -4.06,-3.233 -4.06,-3.56 FB1.2 -3.81,-3.86 -2.756,-4.914 -2.756,-5.121 -2.506,-5.371 C31.1 -2.456,-6.206 -3.02,-6.77 -3.421,-6.77 -4.135,-7.484 U4.3 -4.135,-8.434 -3.535,-9.034 -1.201,-9.034 -0.117,-7.951 -0.117,-6.367 2.65,-3.6 C30.1 U3.1 U3.2 0.71,-0.635 -0.065,0.14 -0.065,0.288 v1(-0.575,0.797) ; C30.1@2.75,-3.6 3.95,-4.8 5.544,-4.8 6.219,-4.125 6.907,-4.125 7.157,-3.875 R8.2 ; v1(4.655,7.491) 4.691,7.491 5.45,8.25 R5.2 ; U1.3 13.5,1.298 13.5,-3.95
  Top Layer w0.5: R8.2 7.307,-3.975 7.307,-4.257 7.661,-4.611 7.661,-4.694 7.975,-5.009 9.107,-5.009 9.341,-4.775 9.341,-4.557 9.949,-3.95 C15.1 13.5,-3.95 16.671,-3.95 L1.1
  L3_SIG_PWR w0.2: v1(-8.8,10.625) -8.8,9.692 -7.758,8.65 -7.5,8.65 -6.05,7.2 v1(-4.075,7.2) 4.297,7.2 4.588,7.491 v1(4.655,7.491)
  L3_SIG_PWR w0.3: v1(-23.665,-3.53) -23.665,2.259 -19.324,6.6 -13.175,6.6 -12.8,6.225 v1(-12.8,5.475) ; v1(-13.25,8.55) -10.083,8.55 -8.8,9.833 v1(-8.8,10.625) ; v1(-0.575,0.797) -0.604,0.826 -1.191,0.826 -1.4,1.035 -4.327,1.035 -5.237,0.125 -5.713,0.125 -6.175,0.587 -6.175,4.108 -4.708,5.575 0.617,5.575 0.7,5.658 5.802,5.658 6.075,5.931 6.075,6.612 5.65,7.037 5.15,7.037 4.696,7.491 v1(4.655,7.491)
AVDD: C12.1 C14.1 R6.2 U1.25 U1.37 | length 17.2
  Top Layer w0.2: C14.1 8.591,-2.409 9.165,-2.409 9.358,-2.215 v1(9.397,-2.215) 9.35,-2.168 9.35,-1.725 9.215,-1.591 9.215,-1.165 9.172,-1.122 U1.37
  Top Layer w0.3: C12.1 4.918,3.925 6.035,3.925 6.139,3.821 6.499,3.821 U1.25 ; R6.2 5.658,-4.05 6.833,-2.875 7.681,-2.875 7.797,-2.759 8.291,-2.759 8.541,-2.509 C14.1
  L3_SIG_PWR w0.2: v1(4.753,3.31) 5.327,2.735 5.622,2.735 6.587,1.771 6.587,1.315 7.551,0.35 8.137,0.35 9.215,-0.728 9.215,-1.59 9.35,-1.725 9.35,-2.168 v1(9.397,-2.215)
CAN_RX: U2.45 U4.4 | length 39.5
  Top Layer w0.2: v1(-11.275,6.775) -11.272,6.778 -11.272,8.252 U2.45 ; v1(-5.45,-6.75) -5.427,-6.772 -5.427,-7.937 U4.4
  L3_SIG_PWR w0.2: v1(-11.275,6.775) -11.275,5.15 -14.938,1.487 -17.996,1.487 -18.06,1.424 -18.494,1.424 -18.558,1.487 -21.792,1.487 -22.259,1.02 -22.259,-2.625 -20.722,-4.162 -20.722,-4.657 -18.629,-6.75 v1(-5.45,-6.75)
CAN_TX: U2.46 U4.1 | length 20.6
  Top Layer w0.2: U2.46 -11.769,7.172 -11.8,7.141 -11.8,5.658 -4.993,-1.149 -4.891,-1.149 -4.744,-1.295 -4.744,-1.755 -3.694,-2.805 -3.611,-2.805 -1.756,-4.66 -1.756,-5.892 -1.595,-6.053 U4.1
CANH: J2.2 J3.2 R14.1 U4.7 | length 17.3
  Top Layer w0.2: J3.2 -9.614,-16.965 -9.05,-16.401 -9.045,-16.401 -7.65,-15.006 -7.248,-15.006 -7.248,-13.804 -5.779,-12.334 -3.415,-12.334 -2.865,-12.884 U4.7 -2.865,-14.974 R14.1 -2.979,-15.138 -2.679,-15.438 -2.679,-15.488 -0.487,-17.68 J2.2
CANL: J2.3 J3.3 JP1.2 U4.6 | length 16.9
  Top Layer w0.2: J3.3 -8.51,-17.552 -7.946,-16.988 -7.942,-16.988 -7.032,-16.079 -6.083,-16.079 -5.683,-15.679 JP1.2 ; U4.6 -4.135,-13.834 -4.335,-14.034 -4.592,-14.034 -5.133,-14.575 -5.133,-14.629 -5.683,-15.179 JP1.2 ; J2.3 0.763,-19.951 0.213,-20.501 -2.141,-20.501 -5.283,-17.359 -5.283,-15.829 JP1.2
DRV_CS: U1.36 U2.39 | length 27.9
  Top Layer w0.2: U2.39 -8.219,8.205 -8.219,7.597 -7.794,7.171 v1(-7.794,7.165) ; U1.36 8.695,-0.375 8.695,-1.305 v1@8.675,-1.325
  L3_SIG_PWR w0.2: v1(-7.794,7.165) -7.842,7.117 -7.842,6.729 -8.194,6.377 -8.194,3.301 -8.294,3.201 -8.294,0.217 -7.85,-0.228 -6.351,-0.228 -6.003,-0.575 -4.947,-0.575 -4.599,-0.228 6.091,-0.228 6.319,0 7.992,0 8.695,-0.703 8.695,-1.305 v1@8.675,-1.325
  other v1: 8.69,-1.4
DRV_FAULT: R6.1 U1.22 U2.25 | length 35.6
  Top Layer w0.2: U2.25 -5.769,0.122 -4.848,-0.799 -4.746,-0.799 -4.394,-1.15 -4.394,-1.253 -3.725,-1.922 -3.725,-2.279 -3.549,-2.455 -1.851,-2.455 -1.675,-2.279 -1.675,1.183 -1.535,1.322 1.129,1.322 1.151,1.3 3.434,1.3 3.725,1.009 3.725,0.261 3.547,0.083 3.547,-0.083 3.725,-0.261 3.725,-0.625 4.8,-1.7 R6.1 ; v1(5.787,5.083) 5.855,5.083 6.044,5.272 6.495,5.272 U1.22
  L3_SIG_PWR w0.2: v1(-5.475,0.7) -5.475,4.242 -4.669,5.049 5.753,5.049 v1(5.787,5.083)
DRV_MISO: R8.1 U1.33 U2.41 | length 28
  Top Layer w0.15: v1(6.98,-0.925) 7.005,-0.9 7.075,-0.9 7.037,-0.862 7.037,-0.786 7.12,-0.704 7.12,-0.404 U1.33 ; v1@7.075,-0.925 6.98,-1.02 6.98,-1.948 R8.1
  Top Layer w0.2: U2.41 -9.269,7.079 -9.033,6.843 v1(-9.033,6.775)
  L3_SIG_PWR w0.2: v1(-9.033,6.775) -9.073,6.735 -9.073,6.25 -9.256,6.068 -9.256,-1.023 -9.138,-1.14 -7.935,-1.14 -7.8,-1.275 6.587,-1.275 6.937,-0.925 v1(6.98,-0.925)
DRV_MOSI: U1.34 U2.42 | length 28.2
  Top Layer w0.15: v1@7.625,-1.24 7.625,-0.352 U1.34
  Top Layer w0.2: U2.42 -9.767,8.253 -9.767,7.088 -9.651,6.972 -9.651,6.51 v1(-9.603,6.463)
  L3_SIG_PWR w0.2: v1(-9.603,6.463) -9.606,6.46 -9.606,2.782 -9.805,2.582 -9.805,-1.028 -9.344,-1.49 -8.08,-1.49 -7.945,-1.625 7.195,-1.625 v1(7.58,-1.24)
DRV_OFF: R5.1 U1.21 U2.16 | length 27.3
  Top Layer w0.2: v1(-11.465,0.82) -11.425,0.632 -11.319,0.527 -11.319,-0.195 U2.16 ; R5.1 5.5,6.55 v1(5.5,6.374) 5.5,5.7 5.568,5.7 5.666,5.799 U1.21
  L3_SIG_PWR w0.2: v1(-11.465,0.82) -11.425,3.418 -10.925,3.918 -10.925,6.383 -10.575,6.733 -10.5,6.733 -9.981,7.252 -9.981,7.354 -9.693,7.642 -9.693,7.808 -9.725,7.84 -9.725,8.11 -9.535,8.3 -7.7,8.3 -6.075,6.675 4.525,6.675 4.875,6.325 5.041,6.325 ; 5.042,6.326 5.452,6.326 v1(5.5,6.374)
DRV_SCK: U1.35 U2.40 | length 27
  Top Layer w0.15: v1@8.15,-0.95 8.15,-0.352 U1.35
  Top Layer w0.2: U2.40 -8.719,8.205 -8.719,7.422 -8.478,7.181 v1(-8.478,7.113)
  L3_SIG_PWR w0.2: v1(-8.478,7.113) -8.478,6.588 -8.544,6.522 -8.544,3.446 -8.731,3.259 -8.731,-0.283 -8.436,-0.578 -6.496,-0.578 -6.148,-0.925 -4.802,-0.925 -4.454,-0.578 6.458,-0.578 6.635,-0.4 7.65,-0.4 v1(8.17,-0.92)
ENC_CS: U2.26 U3.8 | length 5.6
  Top Layer w0.2: U2.26 -5.719,1.705 -5.116,1.705 -4.822,1.411 -4.822,-0.258 -4.631,-0.449 -4.601,-0.449 -4.044,-1.005 -4.044,-1.036 -3.175,-1.905 U3.8
ENC_MISO: U2.28 U3.6 | length 4.2
  Top Layer w0.2: U2.28 -4.869,2.755 -4.122,2.008 -4.122,1.582 -3.175,0.635 U3.6
ENC_SCK: U2.27 U3.7 | length 4.8
  Top Layer w0.2: U2.27 -5.719,2.205 -5.116,2.205 -4.472,1.561 -4.472,0.662 -3.185,-0.625 -2.7,-0.625 U3.7
GND: C4.2 C12.2 C14.2 C15.2 C16.2 C17.2 C18.2 C19.2 C20.2 C21.2 C22.2 C23.2 C24.1 C25.2 C26.2 C27.2 C28.2 C29.2 C30.2 C31.2 D3.1 D4.1 D5.1 J2.4 J3.4 J4.5 R3.2 R4.2 TP3.1 U1.2 U1.4 U1.26 U1.41 U2.19 U2.23 U2.35 U2.47 U3.4 U4.2 U4.8 | length 62.7
  Top Layer w0.2: U2.23 v1(-7.769,0.596) ; v1(12.085,-1.214) 12.085,-1.802 C15.2 11.788,-2.4 v1(12.75,-2.4)
  Top Layer w0.3: v1(-21.7,9.35) C25.2 ; C24.1 -18.277,2.037 v1(-18.277,1.949) C26.2@-18.273,1.949 ; J4.5 -18.288,-14.113 -17.375,-13.2 v1(-16.675,-13.2) ; C27.2 -18.267,-3.519 R3.2 -17.769,-5.88 -17.173,-6.477 -16.69,-6.477 -15.99,-7.177 -14.842,-7.177 -14.666,-7.001 -14.666,-6.653 -14.49,-6.477 C4.2 -11.723,-6.477 -11.547,-6.301 C22.2 v2(-11.015,-3.203) ; v2(-12.425,7) -12.425,7.081 -12.269,7.237 U2.47 ; C22.2@-11.478,-3.203 C20.2 -11.478,-1.396 -11.228,-1.145 -10.544,-1.145 -9.995,-1.145 -9.819,-0.969 -9.819,-0.833 -9.769,-0.783 U2.19 ; C21.2 -8.306,-3.203 C23.2 ; C21.2@-8.35,-3.203 -8.35,-5.253 D4.1 ; J3.4 -7.059,-17.796 -6.851,-17.796 -6.379,-17.323 -6.379,-17.129 v1(-6.35,-17.1) ; v2(-6.775,6.25) -6.77,6.255 U2.35 ; v1(-3.07,6.15) -2.765,6.15 C19.2@-2.47,6.36 ; U4.2@-2.86,-7.4 v1(-2.46,-7.21) ; v1(-1.231,-5.155) C31.2 ; v1(0.136,6.15) 0.236,6.15 D3.1@0.686,6.22 ; v1(1,-3.9) C30.2 ; v2(1.4,1.9) 1.402,1.902 2.697,1.902 U3.4 ; J2.4 2.031,-19.42 2.031,-20.656 v1(2.05,-20.675) ; C12.2@3.06,3.76 3.16,3.51 v1(3.16,3.35) ; v2(8.922,3.048) v2(8.922,2.05) U1.41@8.922,1.798 ; U1.2 10.203,0.797 v2(10,1) v2(8.9,1) 8.922,1.022 U1.41@8.922,1.798 ; U1.4 U1.41@8.922,1.798 ; R4.2 16.3,9.1 17.075,9.875 v2(17.075,9.9)
  Top Layer w0.4: v2(-18.875,13.85) -18.837,13.812 -18.837,12.614 TP3.1 ; v2(-10.15,16.05) -10.1,16.05 D5.1 ; C17.2@-7.271,9.874 -7.134,10.012 -6.439,10.012 v2(-6.401,10.05) ; C16.2 -5.792,11.303 -5.592,11.503 -5.592,11.954 -5.45,12.096 v2(-5.45,12.15) ; v2(-5.45,-3.975) -5.422,-3.947 -5.422,-3.577 C18.2 ; U4.8 -1.595,-13.625 -1.495,-13.725 v2(-0.675,-13.725)
  L3_SIG_PWR w0.3: v2(-6.775,6.25) -3.211,6.25 -3.111,6.15 v1(-3.07,6.15)
  L3_SIG_PWR w0.5: v2(10,1) 12.085,-1.085 v1(12.085,-1.214) 12.75,-1.879 v1(12.75,-2.4)
  other v1: -7.75,-5.25 8.54,-3.91 -8.297,-2.015 -18.321,-0.759 -18.273,0.595 7.026,3.298
  other v2: -9.006,-21.006 -5.006,-21.006 -15.006,-17.006 16.994,-1.006 7.75,1 7.8,2.05 10.1,2.05 7.8,3.1 10.1,3.1 7.82,4.15 8.95,4.15 10.1,4.15 7.8,5.15 8.95,5.15 10.085,5.132 -21.006,10.994 18.994,10.994 -15.006,14.994 16.994,14.994 -13.006,18.994 -9.006,18.994 10.994,18.994
INHA: U1.27 U2.30 | length 14.1
  Top Layer w0.15: U2.30 -5.767,3.752 -4.703,3.752 v1(-4.225,3.275) ; v1(5.623,3.3) 6.129,2.946 6.297,2.85 U1.27
  L3_SIG_PWR w0.15: v1(-4.225,3.275) -3.15,4.35 5.263,4.35 5.788,3.825 5.788,3.545 5.623,3.381 v1(5.623,3.3)
INHB: U1.29 U2.31 | length 16
  Top Layer w0.15: U2.31 -5.759,4.265 -4.277,4.265 v1(-4.267,4.275) ; v1(5.892,1.723) 5.966,1.798 U1.29
  L3_SIG_PWR w0.15: v1(-4.267,4.275) -4.02,4.028 -4.02,3.904 -4.149,3.775 -4.432,3.775 -4.725,3.482 -4.725,3.068 -4.432,2.775 -4.018,2.775 -3.725,3.068 -3.725,3.351 -3.596,3.48 -3.472,3.48 -2.792,2.8 4.803,2.8 5.192,2.41 5.446,2.41 5.834,2.022 5.834,1.78 v1(5.892,1.723)
INHC: U1.31 U2.32 | length 14
  Top Layer w0.2: U2.32 -5.724,4.8 0.809,4.8 3.154,2.455 3.549,2.455 5.181,0.822 6.497,0.822 U1.31
NetC11_2: C11.2 U1.8 | length 3.1
  Top Layer w0.15: U1.8 14.45,3.798 C11.2
NetC13_1: C13.1 U1.7 | length 1.1
  Top Layer w0.2: U1.7 11.323,3.299 12.449,3.299 C13.1
NetC13_2: C13.2 U1.6 | length 2.5
  Top Layer w0.15: U1.6 13.35,2.798 C13.2
NetC24_2: C24.2 R9.1 Y1.1 | length 5.9
  Top Layer w0.3: C24.2 -21.331,3.9 Y1.1 -20,4.26 R9.1
NetC25_1: C25.1 U2.5 Y1.2 | length 10.9
  Top Layer w0.3: C25.1 -19.15,7.6 Y1.2 -15.376,7.6 -15.169,7.394 -15.169,4.981 -14.944,4.755 U2.5
NetD3_2: D3.2 R7.1 U1.23 | length 5.5
  Top Layer w0.2: R7.1 3.886,8.155 D3.2 5.551,4.558 6.001,4.558 6.119,4.675 6.226,4.675 6.349,4.798 U1.23
NetD4_2: D4.2 R11.2 | length 1.7
  Top Layer w0.3: R11.2 -6.743,-3.581 -6.743,-5.221 D4.2
NetD5_2: D5.2 R15.2 | length 4.7
  Top Layer w0.2: R15.2 -8.736,17.614 D5.2
NetJP1_1: JP1.1 R14.2 | length 5.9
  Top Layer w0.2: v1(-4.425,-16.55) -4.425,-15.471 JP1.1 ; R14.2 -1.279,-15.138 -0.979,-15.438 -0.979,-15.804 -0.925,-15.857 v1(-0.925,-15.925)
  L3_SIG_PWR w0.2: v1(-4.425,-16.55) -1.55,-16.55 v1(-0.925,-15.925)
NetL1_2: L1.2 U1.5 | length 7.2
  Top Layer w0.3: U1.5 16.6,2.298
  Top Layer w0.5: 16.6,2.298 16.6,0.466 L1.2
NetR9_2: R9.2 U2.6 | length 1.7
  Top Layer w0.3: R9.2 -15.95,4.255 U2.6
NetR11_1: R11.1 U2.22 | length 2.6
  Top Layer w0.3: U2.22 -8.269,-0.919 -8.04,-1.149 -7.425,-1.149 -6.775,-1.799 R11.1
NRST: C26.1 J4.4 U2.7 | length 29.3
  Top Layer w0.2: J4.4 -18.595,-10.975 v1(-17.7,-10.975) ; v1(-16.585,2.736) -16.585,1.957 C26.1 ; U2.7 -14.219,3.805 -13.616,3.805 -13.254,4.167 v1(-13.244,4.167)
  L3_SIG_PWR w0.2: v1(-17.7,-10.975) -17.7,-10.242 -20.278,-7.665 -20.278,-6.64 -21.072,-5.846 -21.072,-4.307 -22.675,-2.704 -22.675,1.253 -21.891,2.037 -21.891,2.619 -21.773,2.736 v1(-16.585,2.736) -14.675,2.736 v1(-13.244,4.167)
OUTA: J5.1 U1.13 U1.14 | length 12.3
  Top Layer w0.5: J5.1 3,10.85 8.85,10.85 ; 8.62,10.85 9.47,10 9.47,8.85 10.42,7.9 10.42,6.45
OUTB: J5.2 U1.16 U1.17 | length 13.6
  Top Layer w0.5: J5.2 0.75,11.442 0.75,10.443 1.043,10.15 7.462,10.15 8.32,10.15 8.77,9.7 U1.17@8.77,6.45
OUTC: J5.3 U1.19 U1.20 | length 16.1
  Top Layer w0.5: J5.3 -3,9.45 7.172,9.45 6.95,9.45 6.95,6.45
PGND: C1.2 C2.2 C3.2 C5.2 C6.2 C7.2 C8.2 C9.2 C10.2 D2.2 J1.2 R1.2 R4.1 U1.12 U1.15 U1.18 | length 85.7
  Top Layer w0.25: v1(7.85,7.3) 7.85,7.272 8.172,6.95 U1.18 ; U1.12 12.15,5.799 v1(12.15,5.85)
  Top Layer w0.3: v1(9.65,7) 9.65,6.448 U1.15 ; C3.2 C3.2@21.05,3.724 ; C2.2 C2.2@21.85,-0.6
  Top Layer w0.5: v2(21.05,2.8) 21.05,3.724 21.65,3.724 v2(21.65,4.65) ; C2.2@21.85,-0.6 v2(22.9,-0.6) ; C2.2@22,-0.387 22,0.073 22.25,0.323 v2(22.25,0.35)
  Top Layer w0.8: v2(14.208,9.417) 14.5,9.125 14.5,9.1 R4.1 ; R4.1@14.6,9.1 14.763,8.937 14.763,7.784 C10.2 14.792,7.784 C8.2 ; D2.2 18.064,-7.729 18.064,-8.164 v2(18.525,-8.625) 18.521,-8.629 R1.2 ; C7.2 17.861,7.801 C5.2
  Top Layer w1: C1.2@2.05,-8.221 v2(2.05,-7.15) ; v2(3.25,-9.3) C1.2@3.25,-8.221 ; v2(4,-9.3) 4.15,-9.3 v2(4.15,-8.25) 4.15,-8.221 C1.2@3.25,-8.221 ; J1.2 5.245,-20.493 2.603,-17.851 2.183,-17.851 0.789,-16.457 0.789,-11.927 1.983,-10.733 C1.2 C1.2@3.25,-8.221 ; D2.2 18.85,-7.049 v2(18.85,-7.1) ; C3.2 20.726,3.75 v2(21.95,3.75) ; v2(21.85,-1.55) C2.2@21.85,-0.6
  L3_SIG_PWR w0.8: v1(12.15,5.85) 12.15,7.784 13.508,7.784 13.524,7.767 14.281,7.767 14.75,7.299 14.75,7.163 14.813,7.1 v1(17.85,7.1)
  L3_SIG_PWR w1: v2(4.15,-8.25) 13.688,-8.25 14.863,-7.075 16.844,-7.075 16.869,-7.1 v2(18.85,-7.1) 22.65,-3.3 22.65,-1.6 22.25,-1.2 22.25,-0.6 ; v2(21.05,2.8) 21.95,2.8 ; v2(21.65,4.65) 21.65,3.75 v2(21.95,3.75) 21.95,2.8 ; v2(21.85,-1.55) 22.25,-1.55 ; v2(22.9,-0.6) 22.25,-0.6 ; 21.95,2.8 21.95,0.35 v2(22.25,0.35) 22.25,-0.6
  other v1: 14.75,7.1
PHASE_EN: U1.28 U1.30 U1.32 U2.17 | length 37.3
  Top Layer w0.15: U2.17 -10.76,-0.235 -10.76,0.84 v1(-10.75,0.85) ; v1@5.268,2.1 5.239,2.07 v1(5.239,1.91) 5.239,1.444 5.531,1.151 5.946,1.151 6.04,1.246 6.47,1.246 U1.30 ; v1@5.29,2.095 5.345,2.095 5.549,2.299 6.521,2.299 U1.28 ; v1@5.874,0.297 U1.32
  L3_SIG_PWR w0.15: v1(-10.75,0.85) -10.13,1.47 -10.13,6.643 -9.269,7.504 -9.269,7.975 -7.897,7.975 -7.2,7.278 -7.2,6.638 -7.35,6.488 -7.35,6.012 -7.2,5.862 -7.2,1.718 -6.55,1.068 -6.55,0.432 -5.868,-0.25 -5.082,-0.25 -4.534,0.297 v1(5.874,0.297) 5.874,0.801 5.239,1.436 v1(5.239,1.91)
Q1_G: D1.1 Q1.1 R1.1 | length 8.6
  Top Layer w0.3: Q1.1 16.821,-13.04 R1.1 17.545,-10.309 17.721,-10.484 17.721,-10.854 17.926,-11.059 19.116,-11.059 19.321,-10.854 19.321,-10.359 19.497,-10.183 19.967,-10.183 D1.1
SOA: R12.1 U1.40 | length 41.2
  Top Layer w0.15: U1.40 v1(11,-1)
  L3_SIG_PWR w0.2: v1(-21.327,0.615) -21.909,0.033 -21.909,-2.48 -21.332,-3.057 -21.328,-3.061 -19.731,-4.575 10.746,-4.575 10.863,-4.458 10.863,-1.321 v1(11,-1)
SOA_ADC: C28.1 R12.2 U2.8 | length 9.5
  Top Layer w0.15: R12.2 -19.627,1.282 -16.573,1.282 C28.1 ; -17.427,1.282 -17.427,3.255 U2.8
SOB: R13.1 U1.39 | length 36.4
  Top Layer w0.15: U1.39 10.172,-0.998 v1(10.299,-0.998)
  L3_SIG_PWR w0.2: v1(-21.375,-0.79) -21.375,-1.505 -21.559,-1.689 -21.559,-2.335 -21.185,-2.709 -20.75,-2.709 -11.264,-2.603 -8.947,-2.603 -8.888,-2.662 -8.459,-3.09 9.76,-3.09 10.299,-2.552 v1(10.299,-0.998)
SOB_ADC: C29.1 R13.2 U2.9 | length 10.3
  Top Layer w0.15: R13.2 -19.675,-0.082 -16.621,-0.082 C29.1 -15.89,-0.759 -15.89,2.755 U2.9
SOC: R10.1 U1.38 | length 33.8
  Top Layer w0.15: U1.38 9.706,-0.386 9.706,-1.339 v1(9.74,-1.373)
  Top Layer w0.2: R10.1 -21.318,-2.184 v1(-20.968,-2.184)
  L3_SIG_PWR w0.2: v1(-20.968,-2.184) -8.802,-2.253 -8.743,-2.312 -8.33,-2.725 9.135,-2.725 9.15,-2.74 9.615,-2.74 9.922,-2.433 9.922,-1.998 9.788,-1.863 9.788,-1.421 v1(9.74,-1.373)
SOC_ADC: C27.1 R10.2 U2.10 | length 11.1
  Top Layer w0.15: R10.2 -19.621,-1.452 -16.567,-1.452 C27.1 -15.456,-2.113 -15.456,2.255 U2.10
SWCLK: J4.3 U2.38 | length 93.7
  Top Layer w0.2: J4.3 -19.42,-8.425 v1(-18.775,-8.425) ; U2.38 -7.734,8.29 -7.734,9.299 v1(-7.699,9.334)
  L3_SIG_PWR w0.2: v1(-18.775,-8.425) -18.1,-9.1 -7.35,-9.1 -6.35,-10.1 2.424,-10.1 2.774,-10.45 4.476,-10.45 4.826,-10.1 7.5,-10.1 8.2,-9.4 14.165,-9.4 14.19,-9.375 21.958,-9.375 22.075,-9.258 22.075,-5.501 23.8,-3.776 23.8,-3.525 24.05,-3.275 24.05,3.381 22.8,4.631 22.8,5.126 22.126,5.8 21.631,5.8 18.614,8.817 13.959,8.817 13.601,9.175 10.409,9.175 10.134,9.45 5.684,9.45 5.534,9.6 3.816,9.6 3.666,9.45 0.926,9.45 0.921,9.45 0.805,9.334 v1(-7.699,9.334)
SWDIO: J4.2 U2.37 | length 91
  Top Layer w0.2: J4.2 -20.596,-6.225 v1(-19.95,-6.225) ; U2.37 -7.269,8.55 -7.219,8.6 v1(-6.625,8.6)
  L3_SIG_PWR w0.2: v1(-19.95,-6.225) -18.1,-8.075 0.894,-8.075 2.919,-10.1 4.331,-10.1 5.381,-9.05 14.02,-9.05 15.17,-7.9 19.181,-7.9 23.45,-3.631 23.45,-1.181 23.7,-0.931 23.7,3.236 22.45,4.486 22.45,4.981 21.981,5.45 21.353,5.45 18.336,8.467 13.814,8.467 13.798,8.484 10.606,8.484 9.99,9.1 5.54,9.1 5.39,9.25 3.96,9.25 3.81,9.1 1.069,9.1 0.569,8.6 v1(-6.625,8.6)
UART_RX: TP1.1 U2.44 | length 12.9
  Top Layer w0.2: v1(-16.875,12.85) -16.827,12.802 -16.754,12.802 -16.252,12.3 TP1.1 ; U2.44 -10.722,8.208 -10.722,7.347 v1(-10.675,7.3)
  L3_SIG_PWR w0.2: v1(-16.875,12.85) -16.875,11.3 -17.075,11.1 -17.075,9.617 -16.958,9.5 -15.839,9.5 -13.939,7.6 -12.176,7.6 -11.876,7.3 v1(-10.675,7.3)
UART_TX: TP2.1 U2.43 | length 8.8
  Top Layer w0.2: TP2.1 -17.313,10.388 -16.138,10.388 v1(-16.1,10.35) ; U2.43 -10.219,8.305 -10.219,9.088 -10.15,9.157 v1(-10.19,9.305)
  L3_SIG_PWR w0.2: v1(-16.1,10.35) -15.6,9.85 -12.73,9.85 -12.105,9.225 v1(-10.19,9.305)
USB_DM: U2.33
USB_DP: U2.34
VDDA: C20.1 C21.1 C22.1 C23.1 FB1.1 U2.20 U2.21 | length 19.5
  Top Layer w0.5: v1(-13.65,-4.05) -13.65,-3.556 -13.297,-3.203 C22.1 ; C22.1@-13.213,-3.169 -13.213,-1.883 C20.1 ; C22.1@-13.197,-3.203 -13.047,-3.353 -13.047,-3.486 -13.025,-3.508 v1(-13.025,-4.05) ; -9.025,-0.3 -9.1,-0.375 -9.1,-1.028 -9.771,-1.699 -9.856,-1.699 C23.1 -10.036,-1.879 -10.036,-3.173 C21.1 -10.015,-3.203 -9.45,-3.768 v1(-9.45,-3.95) -9.45,-5.38 -8.777,-6.053 -6.145,-6.053 -5.602,-5.51 FB1.1
  L3_SIG_PWR w0.5: v1(-13.65,-4.05) v1(-13.025,-4.05) ; v1@-13.025,-4.075 -10.725,-4.075 -10.625,-3.975 -9.475,-3.975 v1(-9.45,-3.95)
VIN_F: F1.2 Q1.3 | length 10.3
  Top Layer w1: F1.2@7.359,-13.942 7.53,-14.113 9.163,-14.113 10.571,-15.521 14.121,-15.521 14.15,-15.55 16.862,-15.55 Q1.3
VIN_RAW: F1.1 J1.1 | length 14.2
  Top Layer w1: F1.1@2.379,-13.942 2.379,-16.35 6.162,-16.35 6.179,-16.367 8.539,-16.367 8.556,-16.35 8.95,-16.35 8.95,-16.9 11.5,-16.9 11.5,-18.743 J1.1
VM: C1.1 C2.1 C3.1 C5.1 C6.1 C7.1 C8.1 C9.1 C10.1 C11.1 D1.2 D2.1 Q1.2 R2.1 R7.2 U1.9 U1.10 U1.11 | length 100.8
  Top Layer w0.25: v1@13.55,4.298 v1(13.55,4.3)
  Top Layer w0.33: U1.9 v1@13.55,4.298
  Top Layer w0.5: v2(-14.75,-5.175) -14.733,-5.158 -14.733,-3.566 R2.1 ; C8.1 13.24,5.186 v1(13.24,5.701) 13.24,6.395 C9.1 ; C9.1@13.11,6.684 13.11,7.1 ; 13.113,7.1 C10.1 ; C11.1@16.161,3.8 C7.1 16.161,6.404 C6.1 C5.1 ; v2@18.933,4.468 19.496,5.031 20.181,5.031 v2(20.2,5.05) ; v2(18.985,4.416) 18.985,4.443 18.761,4.667 18.761,5.007 19.05,5.296 v2(19.05,5.3)
  Top Layer w1: v2(1.4,8.3) 2.286,8.3 R7.2 ; v2(7.359,-6.043) 7.323,-6.043 C1.1 8.473,-8.221 10.65,-6.043 11.479,-6.043 11.854,-6.419 11.904,-6.419 12.484,-6.999 D2.1 ; Q1.2 15.521,-12.649 15.521,-10.571 13.064,-8.114 13.064,-7.629 D2.1 ; v2(18.985,4.416) 19.012,4.389 19.012,3.109 19.56,2.561 19.726,2.561 20.35,1.938 20.35,1.036 C3.1@20.387,0.999 ; D1.2 20.35,-5.219 ; C3.1 C3.1@20.387,0.999 ; D2.1 15.018,-7.049 15.604,-6.463 15.604,-5.629 16.014,-5.219 20.35,-5.219 ; 20.35,-5.219 21.4,-5.219 C2.1 20.7,-3.325 20.7,-2.202 19.85,-1.352 19.85,0.152 20.35,0.652 20.35,0.961 C3.1@20.387,0.999
  L3_SIG_PWR w0.5: v2(-14.75,-5.175) -13.882,-6.043 v2(7.359,-6.043)
  L3_SIG_PWR w1: v2(1.4,8.3) 4.142,8.3 4.292,8.45 5.058,8.45 5.208,8.3 9.658,8.3 11.05,6.908 11.05,5.394 11.694,4.75 13.24,4.75 ; v1(13.24,5.701) 13.24,4.75 ; v1@13.25,5.701 v1(13.25,6.684) ; v1(13.55,4.3) 13.24,4.61 13.24,4.75 ; v2(18.985,4.416) 19.014,4.445 19.595,4.445 v2(20.2,5.05) ; v2(19.05,5.3) 18.1,5.3 17.1,4.3 15.6,4.3 15.15,4.75 13.24,4.75
  other v1: 16.15,4.42
VM_SENSE: C4.1 R2.2 R3.1 U2.11 | length 10.7
  Top Layer w0.2: C4.1 -16.069,-6.477 R3.1 -15.769,-3.219 -15.532,-3.219 -15.415,-3.102 -15.415,-2.975 -15.239,-2.799 -14.832,-2.799 -14.715,-2.682 R2.2 -14.715,0.597 -15.119,1.001 -15.119,1.509 -14.973,1.655 -14.819,1.655 -14.719,1.755 U2.11
pads on no net: J2.1 J2.5 J2.6 J3.1 J3.5 J3.6 U1.1 U1.24 U2.2 U2.3 U2.4 U2.12 U2.13 U2.14 U2.15 U2.18 U2.29 U3.3 U3.5 U4.5

## Polygon pours and split planes (outlines as drawn)
GND on L2_GND "L2_GND-GND" (solid, remove dead copper, pour order 19): 0,-25 cw(c0,0) -25,0 cw(c0,0) 0,25 cw(c0,0) 25,0 cw(c0,0)
PGND on L2_GND "L2_GND-PGND" (solid, pour order 0): 0,-12.5 26,-12.5 26,-5 0,-5
PGND on L2_GND "L2_GND-PGND 1" (solid, pour order 1): 3.6,-16.6 26,-16.6 26,-12.5 3.6,-12.5
PGND on L2_GND "L2_GND-PGND 2" (solid, remove dead copper, pour order 2): 5.8,-26 26,-26 26,-16.6 5.8,-16.6
PGND on L2_GND "L2_GND-PGND 3" (solid, pour order 3): 19.7,-5 26,-5 26,8.5 19.7,8.5
PGND on L2_GND "L2_GND-PGND 4" (solid, pour order 4): 15.4,3.6 26,3.6 26,8.5 15.4,8.5
PGND on L2_GND "L2_GND-PGND 5" (solid, pour order 5): 11.7,3.6 15.4,3.6 15.4,14.7 11.7,14.7
PGND on L2_GND "L2_GND-PGND 6" (solid, pour order 6): 6.4,6 11.7,6 11.7,14.7 6.4,14.7
PGND on L2_GND "L2_GND-PGND 7" (solid, pour order 7): 11,5.5 11.7,5.5 11.7,6 11,6
PGND on L2_GND "L2_GND-PGND 8" (solid, pour order 8): -4.7,9.2 6.4,9.2 6.4,14.7 -4.7,14.7
GND on Bottom Layer "Bottom Layer-GND" (solid, remove dead copper, pour order 18): 0,-25 cw(c0,0) -25,0 cw(c0,0) 0,25 cw(c0,0) 25,0 cw(c0,0)
PGND on Bottom Layer "Bottom Layer-PGND" (solid, pour order 9): 0,-12.5 26,-12.5 26,-5 0,-5
PGND on Bottom Layer "Bottom Layer-PGND 1" (solid, pour order 10): 3.6,-16.6 26,-16.6 26,-12.5 3.6,-12.5
PGND on Bottom Layer "Bottom Layer-PGND 2" (solid, remove dead copper, pour order 11): 5.8,-26 26,-26 26,-16.6 5.8,-16.6
PGND on Bottom Layer "Bottom Layer-PGND 3" (solid, pour order 12): 19.7,-5 26,-5 26,8.5 19.7,8.5
PGND on Bottom Layer "Bottom Layer-PGND 4" (solid, pour order 13): 15.4,3.6 26,3.6 26,8.5 15.4,8.5
PGND on Bottom Layer "Bottom Layer-PGND 5" (solid, pour order 14): 11.7,3.6 15.4,3.6 15.4,14.7 11.7,14.7
PGND on Bottom Layer "Bottom Layer-PGND 6" (solid, pour order 15): 6.4,6 11.7,6 11.7,14.7 6.4,14.7
PGND on Bottom Layer "Bottom Layer-PGND 7" (solid, pour order 16): 11,5.5 11.7,5.5 11.7,6 11,6
PGND on Bottom Layer "Bottom Layer-PGND 8" (solid, pour order 17): -4.7,9.2 6.4,9.2 6.4,14.7 -4.7,14.7

## Keep-outs
Top Layer:
  circle w1.45: c-12.021,12.021 r2.075
  circle w1.45: c12.021,-12.021 r2.075
  circle w1.45: c-12.021,-12.021 r2.075
  circle w1.45: c12.021,12.021 r2.075
Keep-Out Layer:
  circle w0.5: c-12.021,12.021 r1.6
  circle w0.5: c12.021,12.021 r1.6
  circle w0.5: c-12.021,-12.021 r1.6
  circle w0.5: c12.021,-12.021 r1.6
  lines w0.61: -25,0 cw(c0,0) 0,25 cw(c0,0) 25,0 cw(c0,0) 0,-25 cw(c0,0) -25,0

## Other copper
Top Layer:
  rectangle net OUTB: 8.77,6.45 9.27,6.75
  rectangle net VM: 11.4,4.17 13.716,5.4
  rectangle net VDDA: -9.35,-0.775 -8.7,0.2
  rectangle net OUTA: 10.097,6.15 10.673,6.604
  rectangle net OUTB: 8.67,6.2 9.2,6.604
  rectangle net OUTC: 7.172,6.15 7.75,6.604

## Silkscreen, mask and mechanical layers (free items; w line width, h text height)
Top Overlay:
  circle w0.2: c12.1,-0.5 r0.1
Mechanical 1:
  the board outline again, w0.1
Mechanical 39:
  circle w0.013: c0,0 r25
  circle w0.013: c12.021,-12.021 r1.038
  circle w0.013: c12.021,12.021 r1.038
  circle w0.013: c-12.021,12.021 r1.038
  circle w0.013: c-12.021,-12.021 r1.038
  lines w0.013: -6.118,15.75 ccw(c-5.368,15.75) -5.368,15 5.368,15 ccw(c5.368,15.75) 6.118,15.75 6.118,18.486 ccw(c5.368,18.486) 5.577,19.207 ccw(c0,0) -5.577,19.207 ccw(c-5.368,18.486) -6.118,18.486 -6.118,15.75

## Text inside footprints (layer, text, board x,y; h text height)
U1: Top Overlay "*" at 12.732,0.682 h1.27 r180; Mechanical 13 "*" at 11.284,0.682 h1.27 r180